# Altium PCB Whisper_pcb.PcbDoc (part 1 of 2)
Units mil, origin at the board's own origin, x right, y up, seen from the top; angles counter-clockwise.
Board outline 2755.91 x 3228.35 mil, 4 copper layers (Top Layer, GND, PWR, Bottom Layer), stack 23.756 mil thick; 209 components, 169 nets, 843 pads, 233 vias.
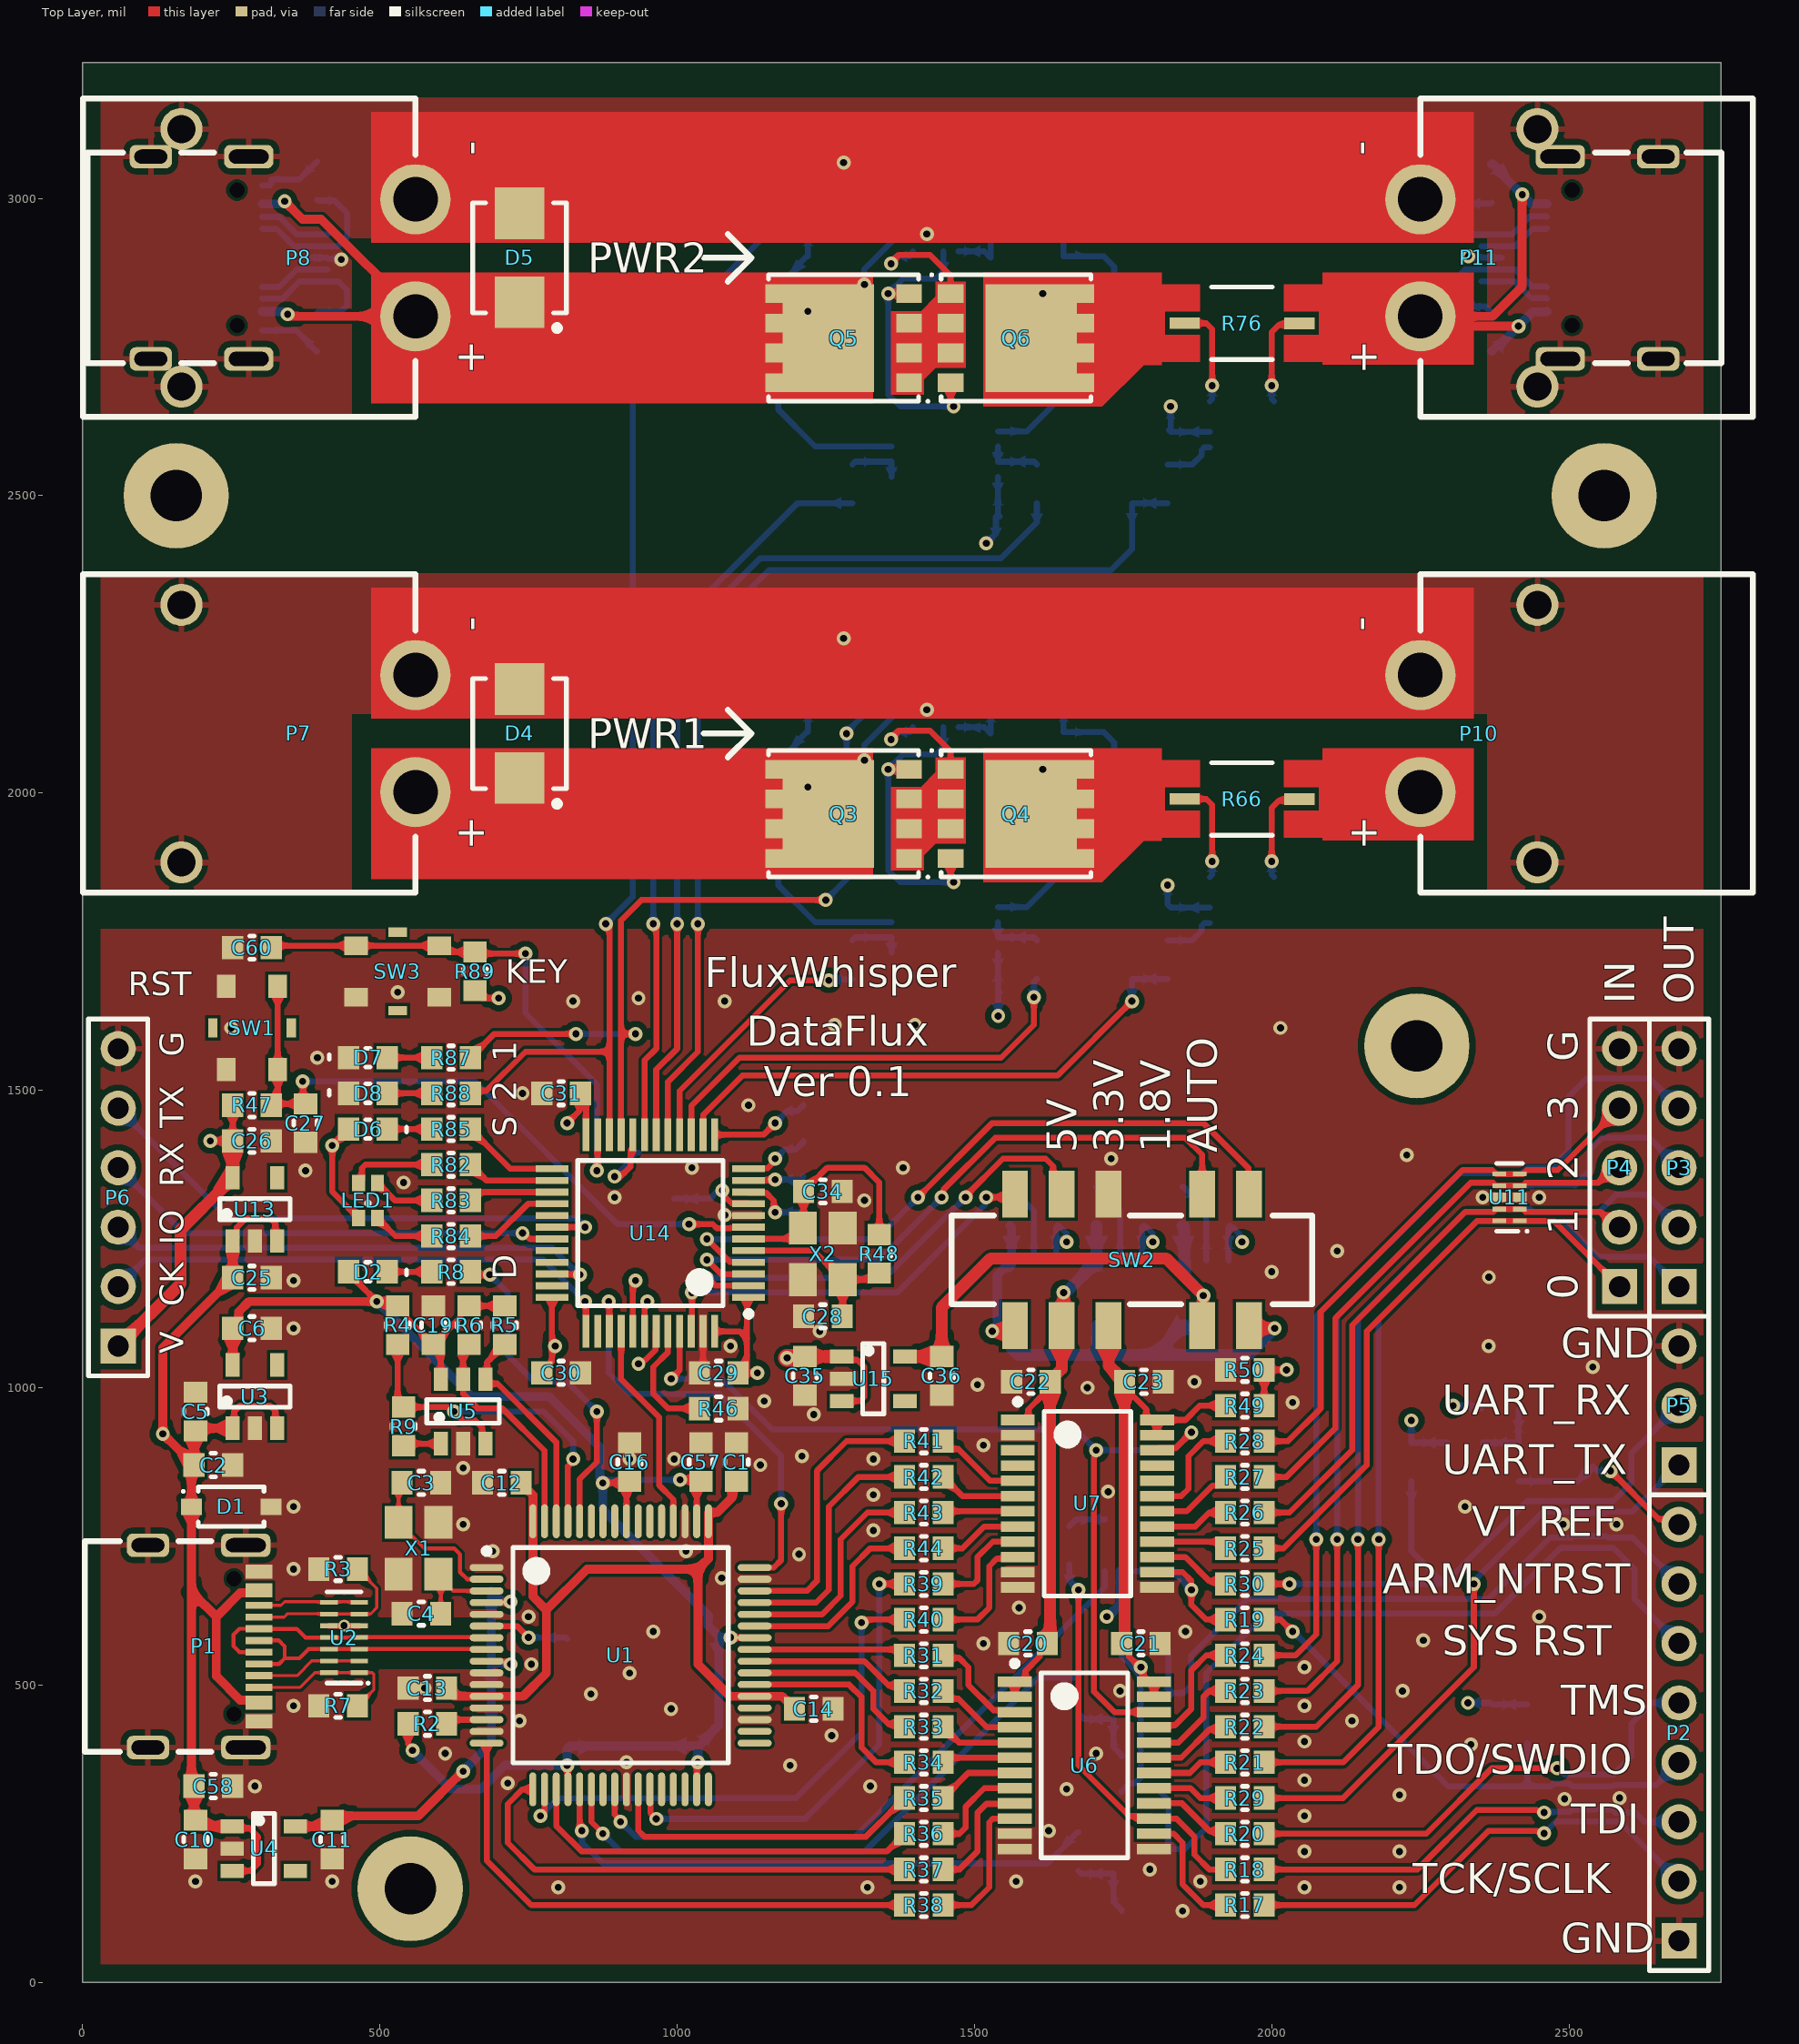
[diagram p0: Top Layer view]
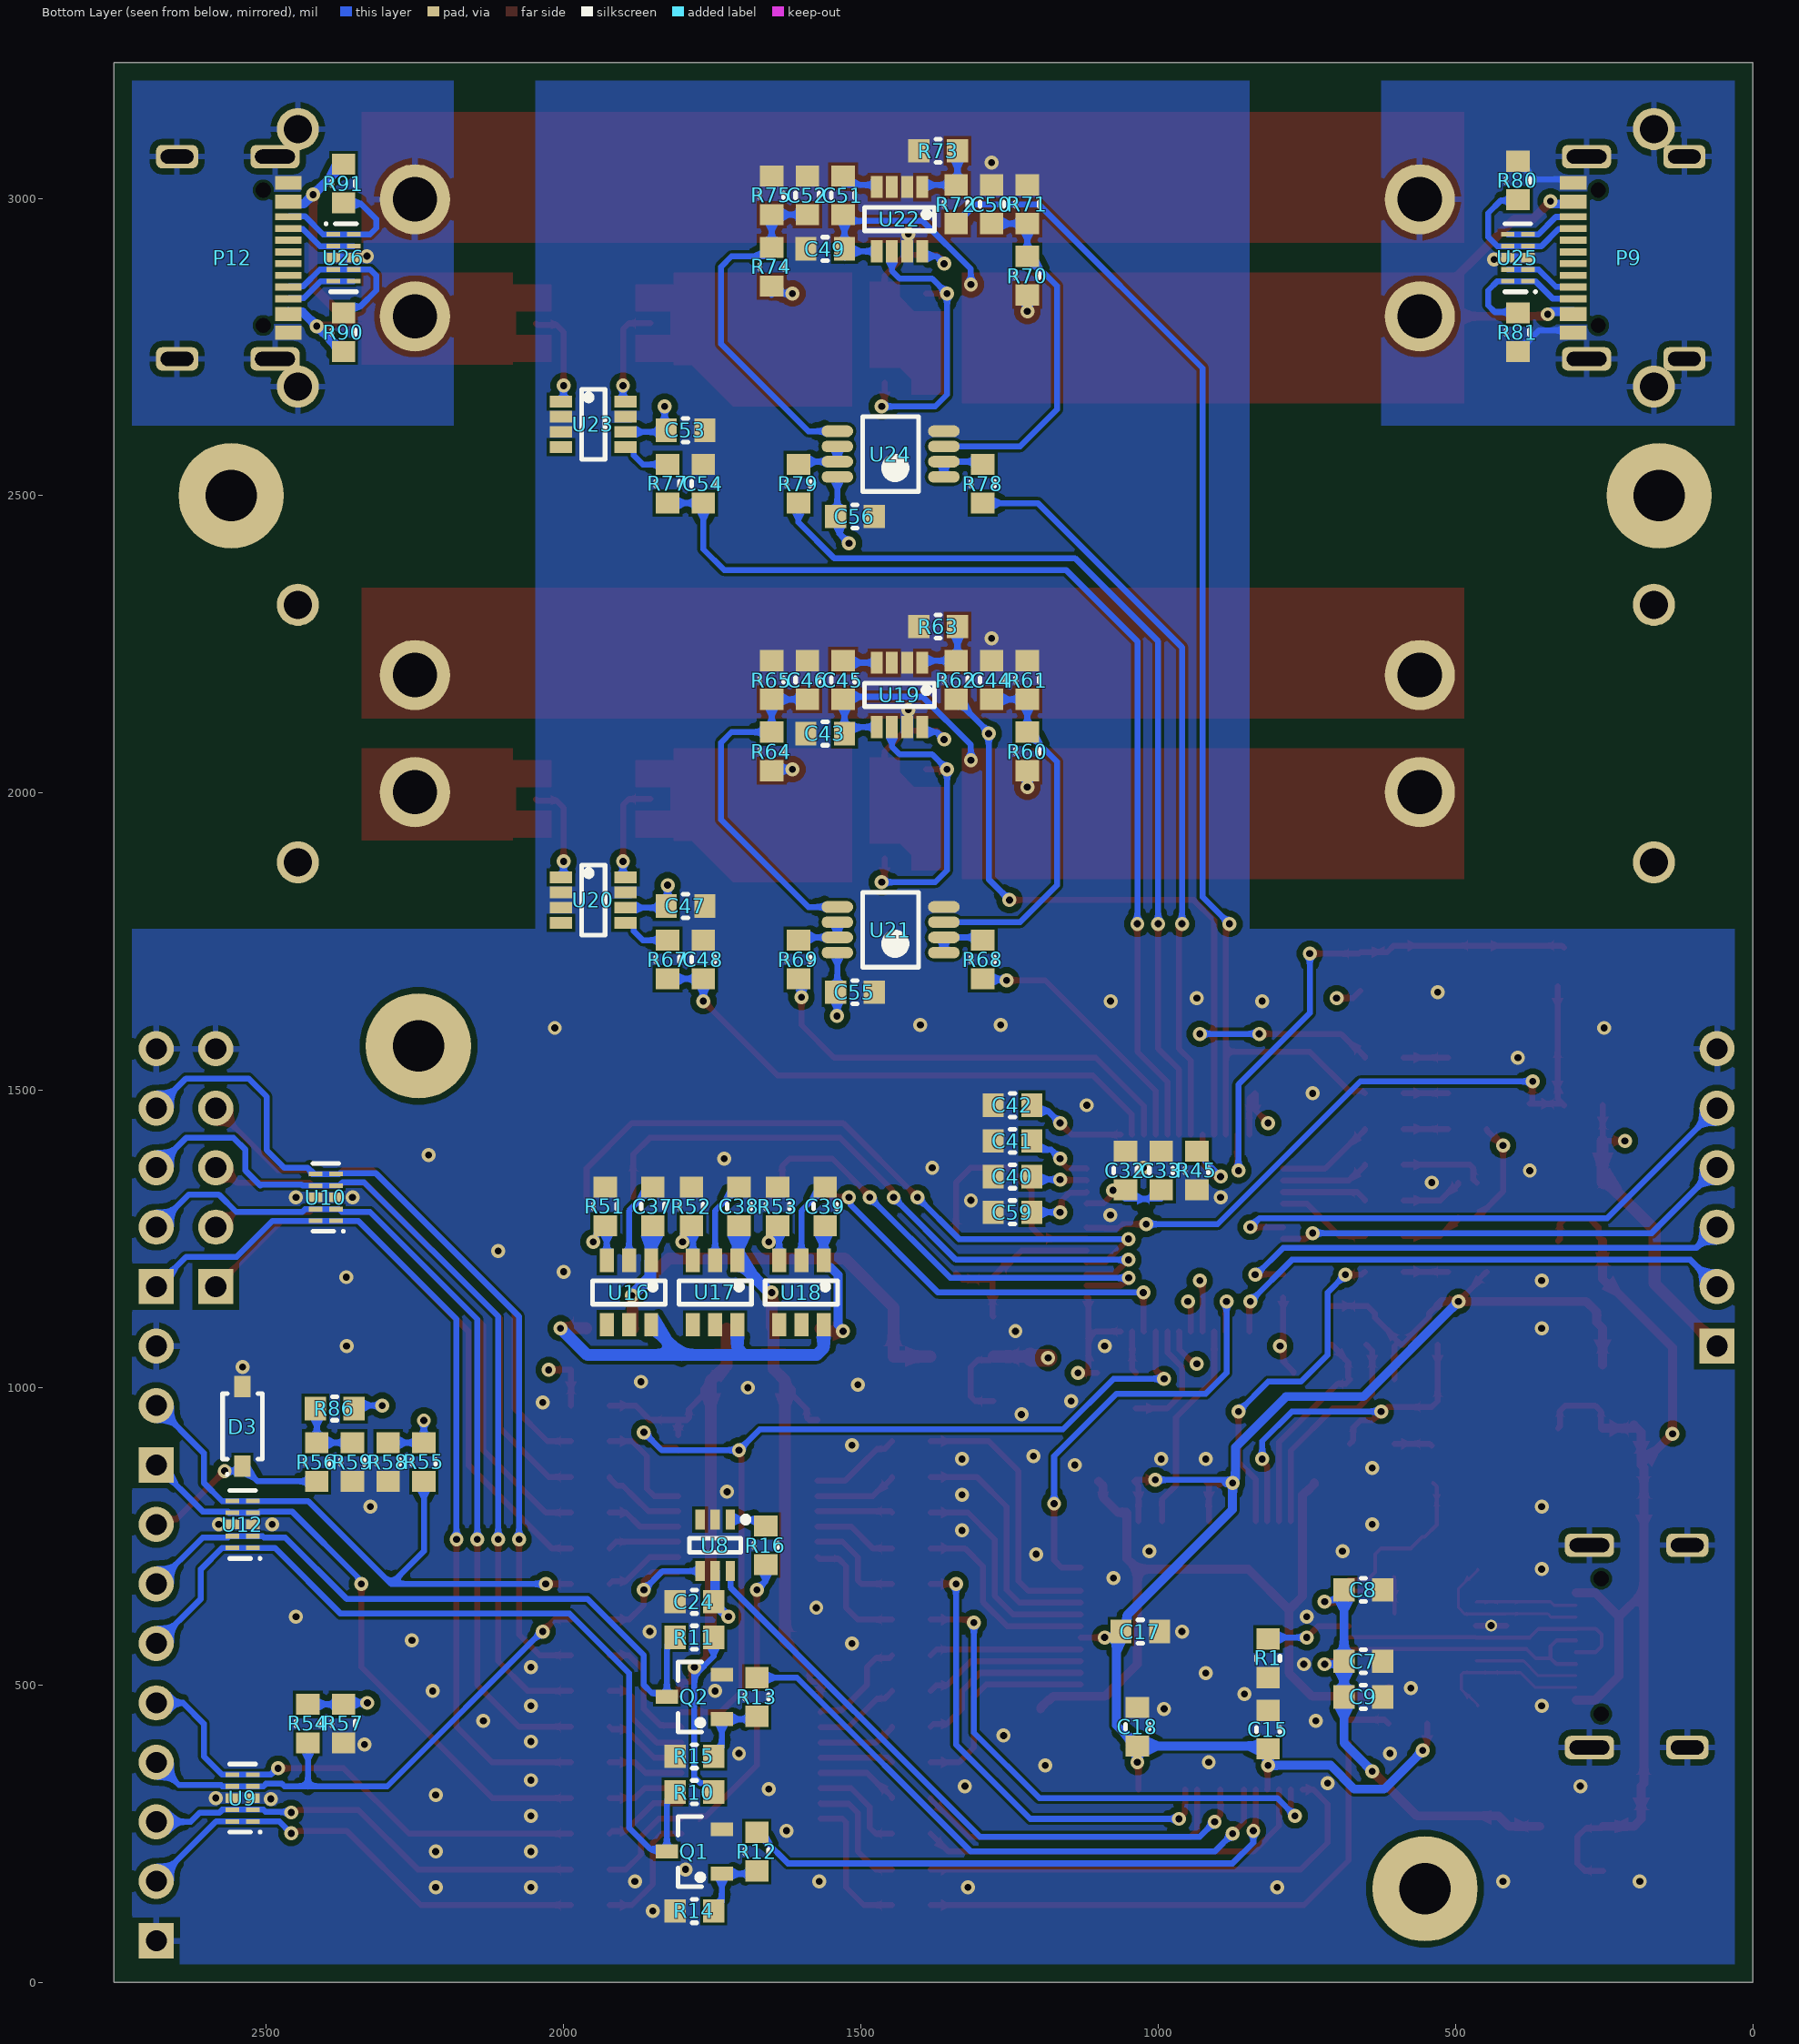
[diagram p1: Bottom Layer view, seen from below]
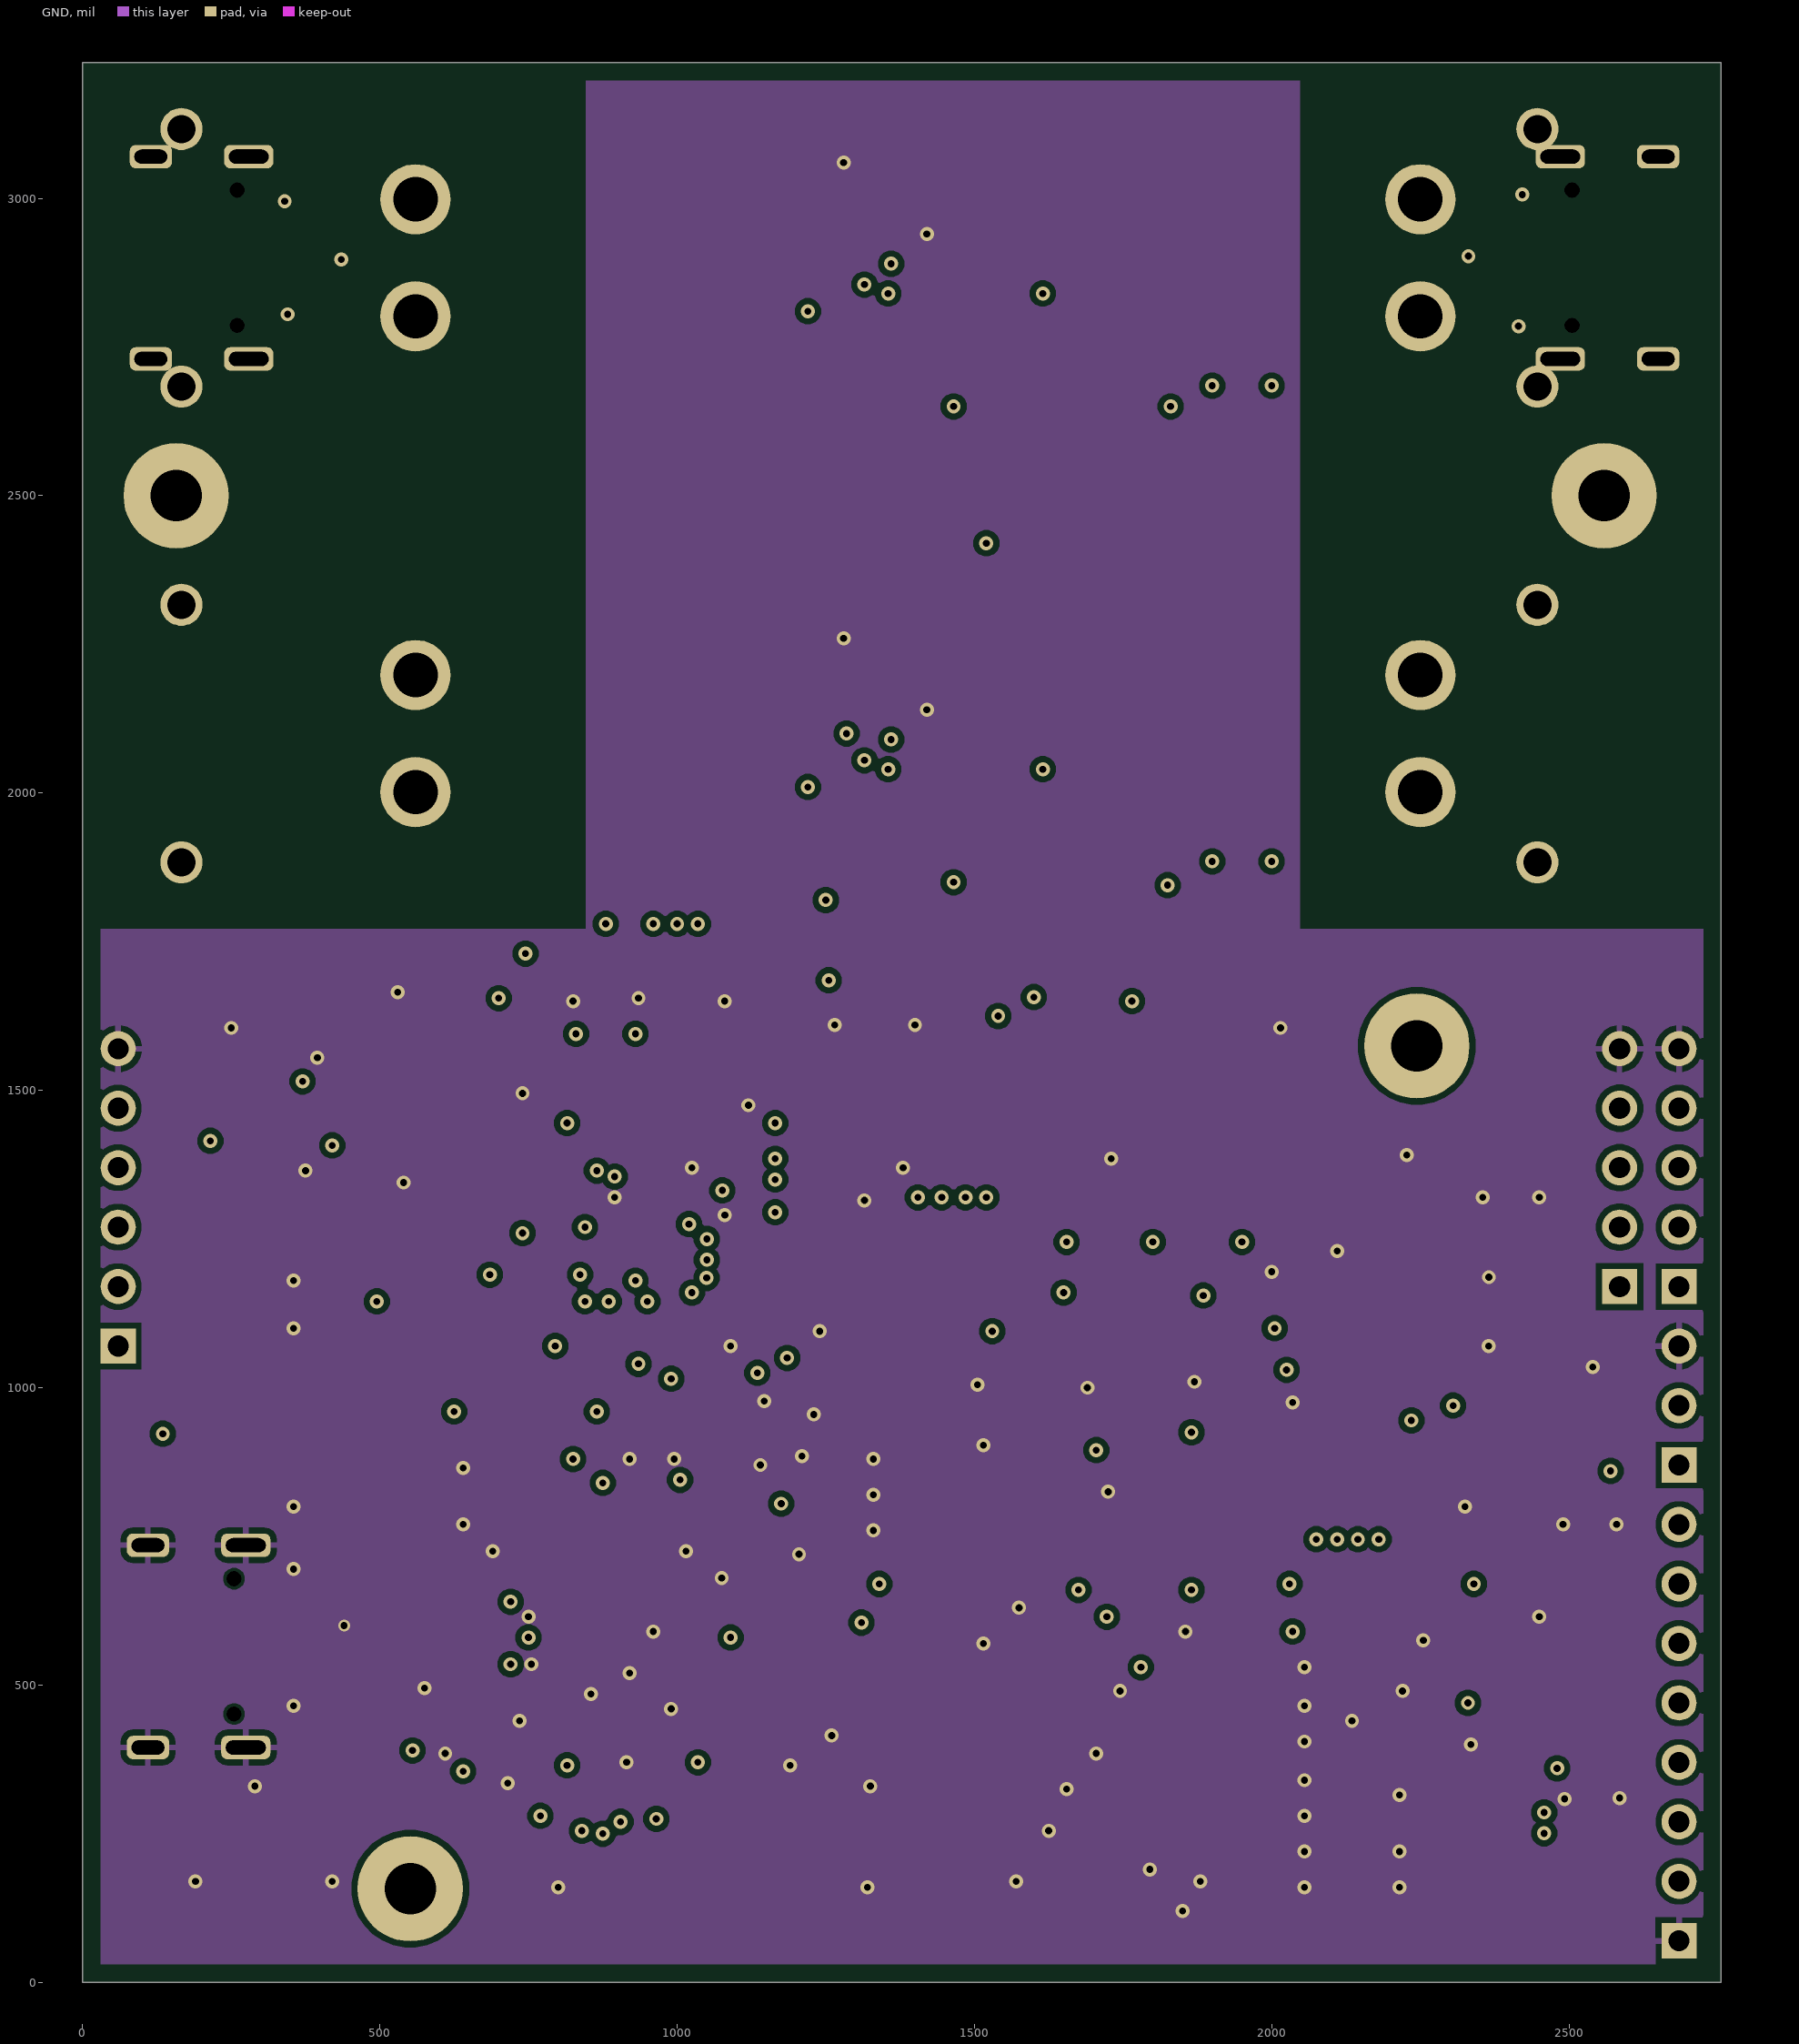
[diagram p2: GND]
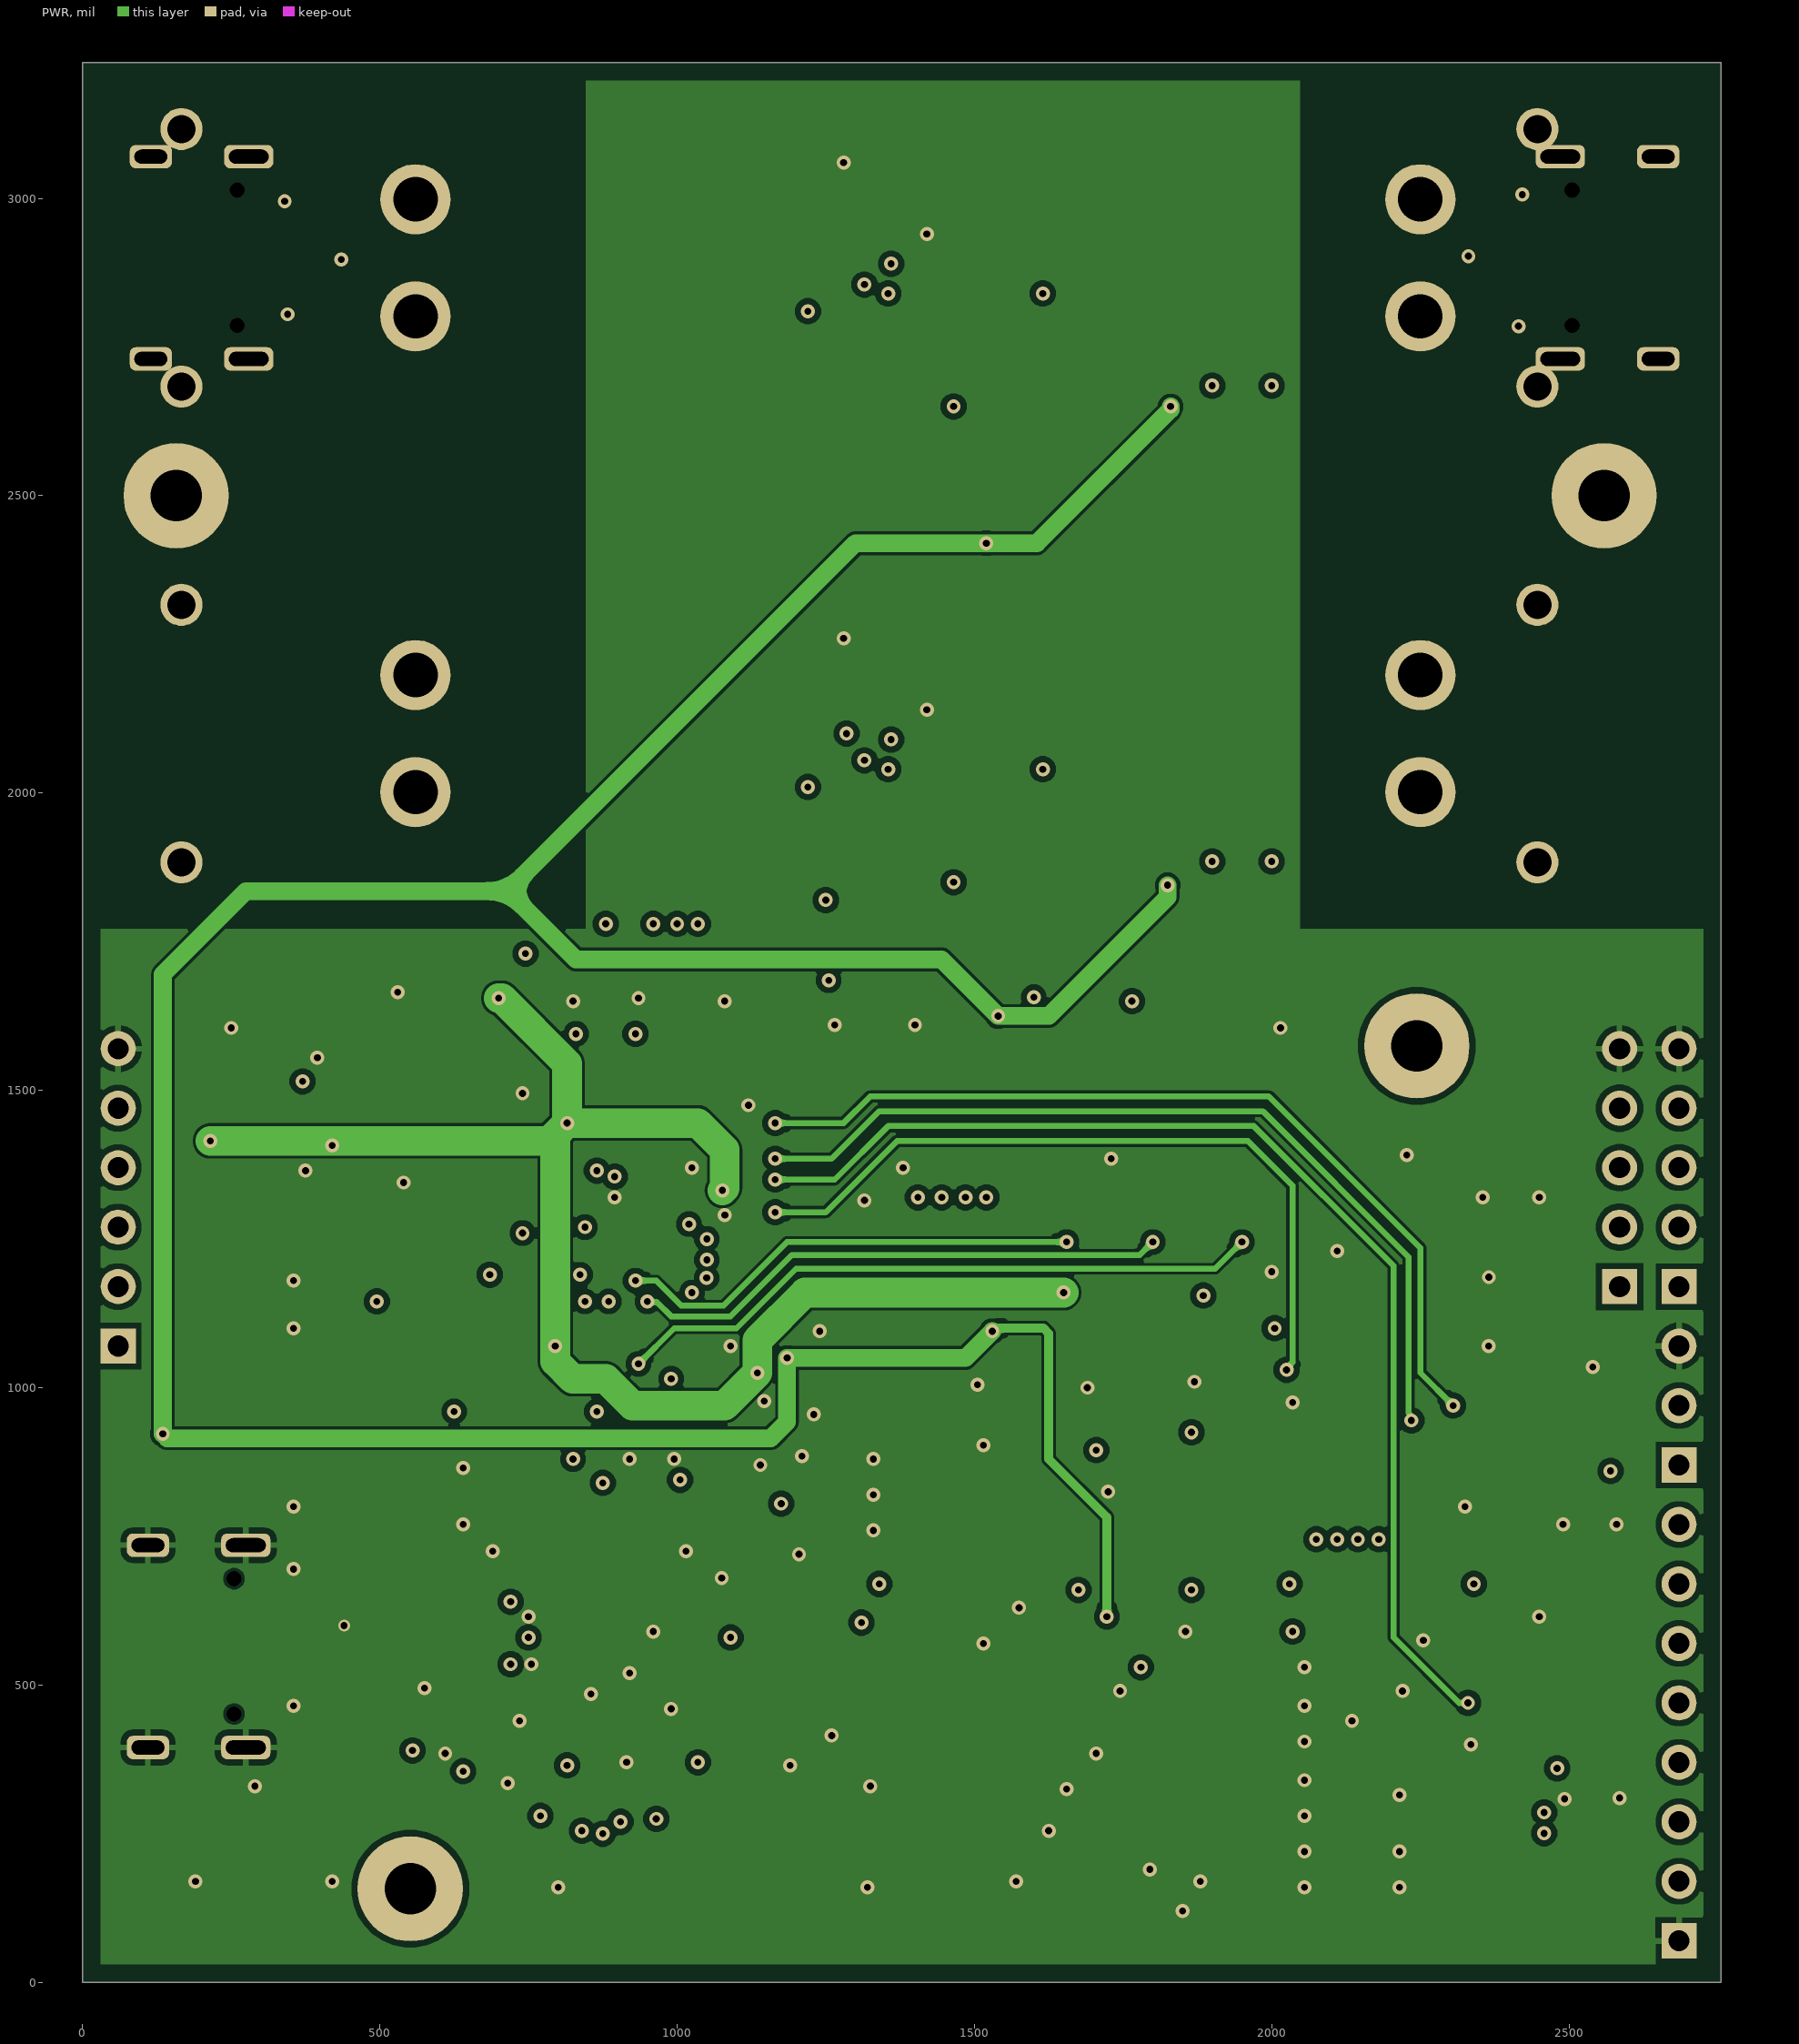
[diagram p3: PWR]
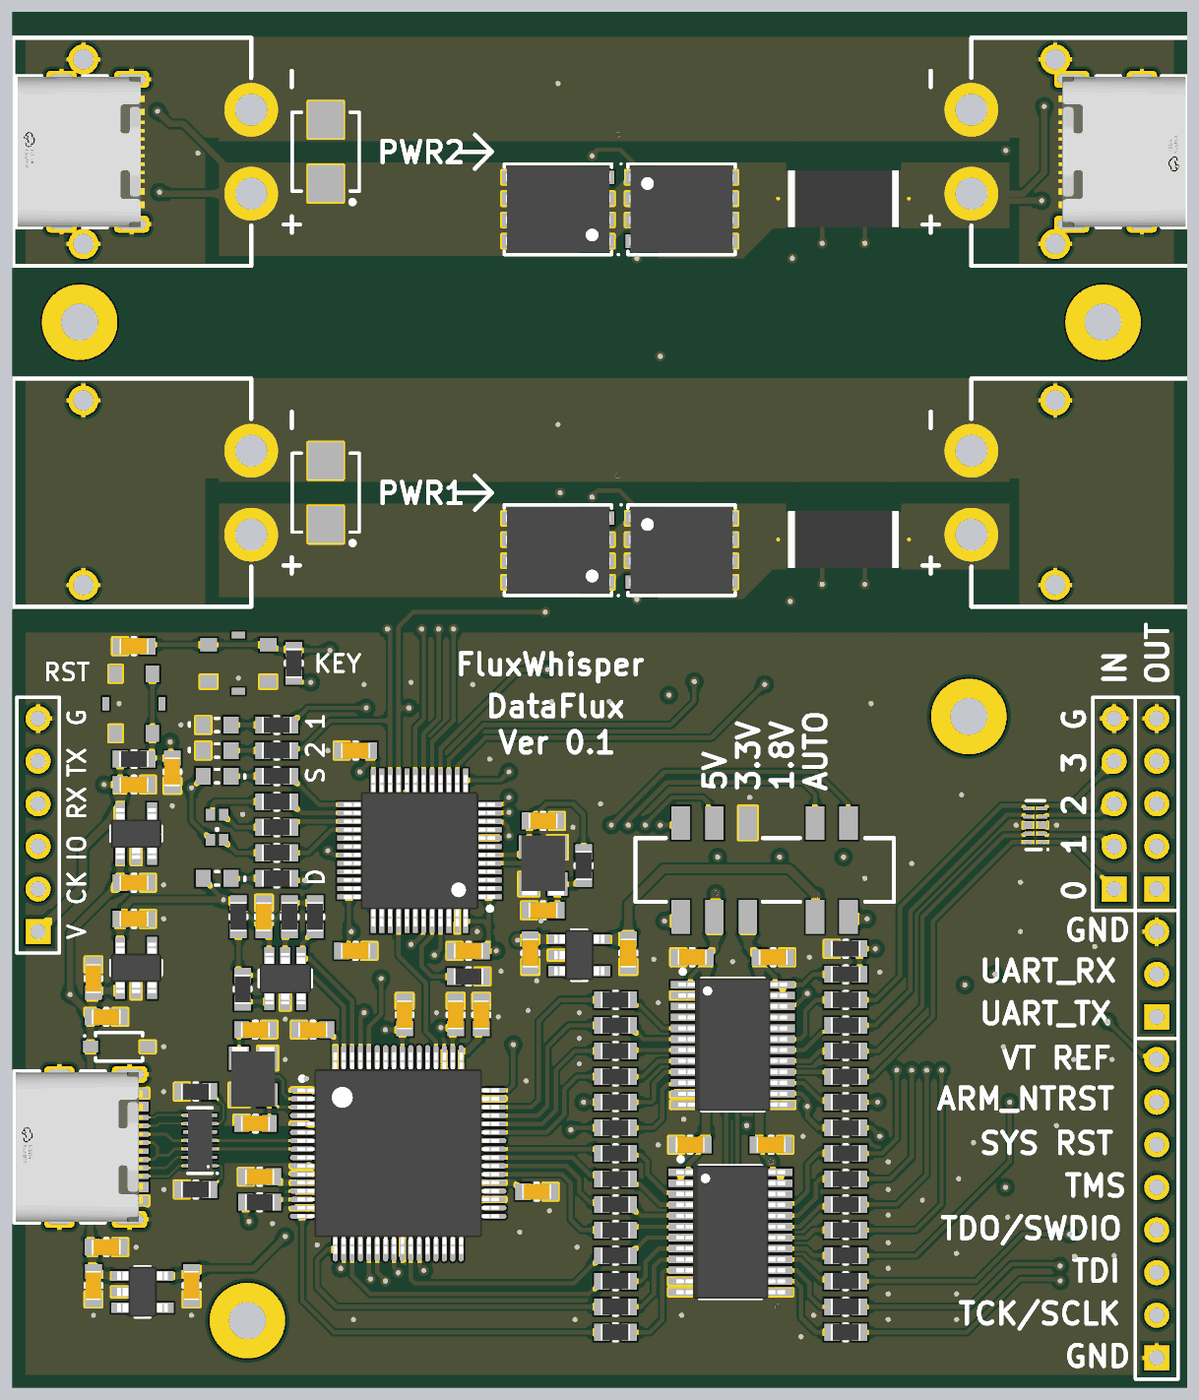
[diagram p5: 3D render of the assembled board from above, using the file's embedded part models]
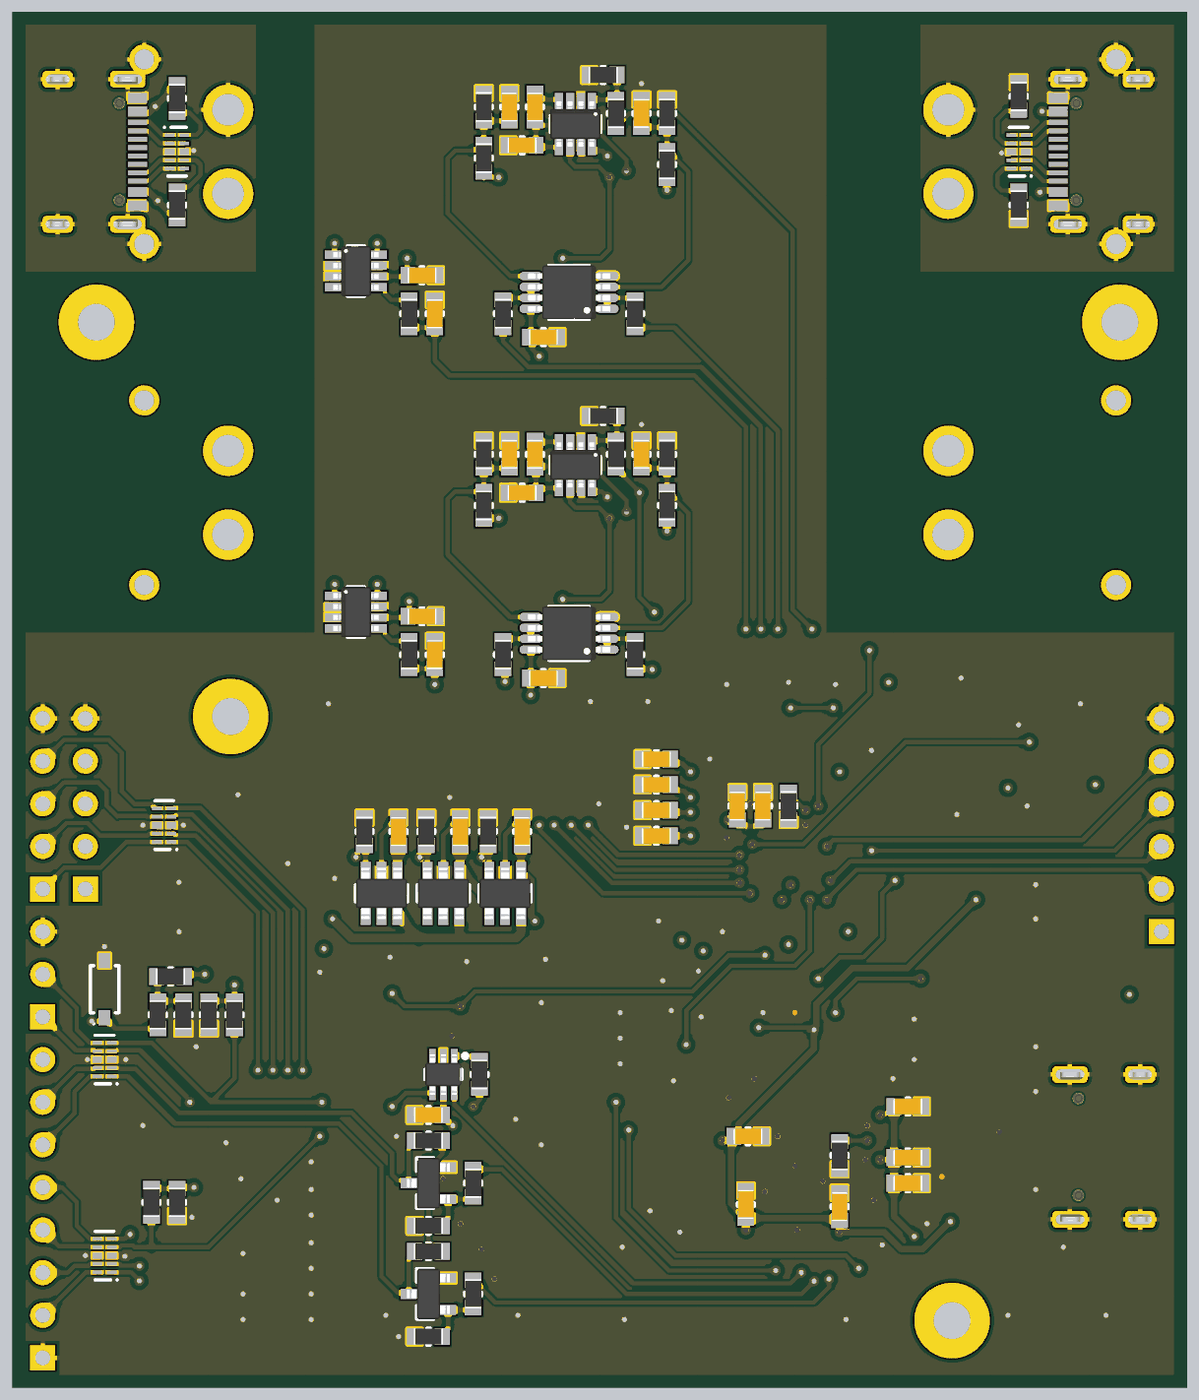
[diagram p6: 3D render of the assembled board from below, using the file's embedded part models]

## Layer stack, top to bottom
Top Solder: solder mask 0.4, Solder Resist, Dk 3.5
Top Layer: signal copper 1.4
Dielectric 2: prepreg 2.8, PP-006, Dk 4.1
GND: signal copper 1.378
Dielectric 1: dielectric 12.6, FR-4, Dk 4.8
PWR: signal copper 1.378
Dielectric 3: prepreg 2.8, PP-006, Dk 4.1
Bottom Layer: signal copper 1.4
Bottom Solder: solder mask 0.4, Solder Resist, Dk 3.5

## Board outline
0,0 2755.91,0 2755.91,3228.35 0,3228.35

## Design rules (kind name [scope] priority, off if disabled: settings)
BoardOutlineClearance [All] p1: gap=15.75 ignorepadtopadclearanceinfootprint=FALSE except(30: Poly-OutlineEdge Poly-CavityEdge Poly-CutoutEdge Poly-SplitBarrior Poly-SplitContinuation)
Clearance Clearance_USB [InNetClass('USB')] p1: gap=5 ignorepadtopadclearanceinfootprint=TRUE except(10: THPad-Fill THPad-Poly THPad-Region Via-Fill Via-Poly Via-Region Fill-Fill Fill-Poly Fill-Region Poly-Poly Poly-Region Region-Region; 30: Arc-Fill Arc-Poly Arc-Region Track-Fill Track-Poly Track-Region)
Clearance [All] p2: gap=5 ignorepadtopadclearanceinfootprint=TRUE except(10: THPad-Fill THPad-Poly THPad-Region Via-Fill Via-Poly Via-Region Fill-Fill Fill-Poly Fill-Region Poly-Poly Poly-Region Region-Region)
ComponentClearance [All] p1: gap=5 collisioncheckmode=3 verticalgap=10 showdistances=FALSE
DiffPairsRouting [InDifferentialPair('USB_D')] p1: maxlimit=14 minlimit=10 mostfreqgap=10 toplayer_prefgap=14 toplayer_minwidth=6.8 toplayer_maxwidth=6.8 toplayer_prefwidth=6.8 midlayer1_maxgap=10 midlayer1_minwidth=15 midlayer1_maxwidth=15 midlayer1_prefwidth=15 midlayer2_maxgap=10 midlayer2_minwidth=15 midlayer2_maxwidth=15 midlayer2_prefwidth=15 bottomlayer_maxgap=10 bottomlayer_minwidth=15 bottomlayer_maxwidth=15 bottomlayer_prefwidth=15 maxuncoupledlength=500
MinimumSolderMaskSliver [All] p1: minsoldermaskwidth=3.94
PolygonConnect [All] p1: thpad.connectstyle=Relief thpad.reliefconductorwidth=10 thpad.reliefentries=4 thpad.polygonreliefangle="90 Angle" thpad.airgapwidth=10 smdpad.connectstyle=Direct smdpad.reliefconductorwidth=10 smdpad.reliefentries=4 smdpad.polygonreliefangle="90 Angle" smdpad.airgapwidth=10 via.connectstyle=Direct via.reliefconductorwidth=10 via.reliefentries=4 via.polygonreliefangle="90 Angle" via.airgapwidth=10
RoutingVias [All] p1: holewidth=11.81 width=23.62 viastyle="Through Hole" minholewidth=11.81 minwidth=19.68 maxholewidth=157.48 maxwidth=196.85
SolderMaskExpansion [All] p1: expansion=4 istentingtop=FALSE
SupplyNets "Schematic Supply Nets_22" [InNet('VTref')] p1: voltage=0.000
SupplyNets "Schematic Supply Nets_21" [InNet('VCORE')] p2: voltage=0.000
SupplyNets "Schematic Supply Nets_20" [InNet('VCC_PORT')] p3: voltage=0.000
SupplyNets "Schematic Supply Nets_19" [InNet('AVCC_FT')] p4: voltage=0.000
SupplyNets "Schematic Supply Nets_18" [InNet('VBUS')] p5: voltage=0.000
SupplyNets "Schematic Supply Nets_17" [InNet('+1.8V')] p6: voltage=0.000
SupplyNets "Schematic Supply Nets_7" [InNet('VCCIO')] p7: voltage=0.000
SupplyNets "Schematic Supply Nets_5" [InNet('VCC_AUTO')] p8: voltage=0.000
SupplyNets "Schematic Supply Nets_3" [InNet('VCC')] p9: voltage=0.000
SupplyNets "Schematic Supply Nets" [InNet('GND')] p10: voltage=0.000
Width [All] p1: maxlimit=100 minlimit=5 preferedwidth=10 minimp=50.000000 maximp=50.000000 favimp=50.000000
27 further rules are at their usual default settings.

## Classes and differential pairs
net class USB: USB_D_N USB_D_P
component class Whisper_Power: C43 C44 C45 C46 C47 C48 C49 C50 C51 C52 C53 C54 C55 C56 D4 D5 P7 P8 P9 P10 P11 P12 Q3 Q4 Q5 Q6 R60 R61 R62 R63 R64 R65 R66 R67 R68 R69 R70 R71 R72 R73 R74 R75 R76 R77 R78 R79 R80 R81 R90 R91 U19 U20 U21 U22 U23 U24 U25 U26
component class Whisper_Ports: C20 C21 C22 C23 C24 P2 P3 P4 P5 Q1 Q2 R10 R11 R12 R13 R14 R15 R16 R17 R18 R19 R20 R21 R22 R23 R24 R25 R26 R27 R28 R29 R30 R31 R32 R33 R34 R35 R36 R37 R38 R39 R40 R41 R42 R43 R44 U6 U7 U8 U9 U10 U11 U12
component class Whisper_MCU: C25 C26 C27 C28 C29 C30 C31 C32 C33 C34 C35 C36 C37 C38 C39 C40 C41 C42 C59 C60 D3 D6 D7 D8 LED1 P6 R45 R46 R47 R48 R49 R50 R51 R52 R53 R54 R55 R56 R57 R58 R59 R82 R83 R84 R85 R86 R87 R88 R89 SW1 SW2 SW3 U13 U14 U15 U16 U17 U18 X2
component class Whisper_Debugger: C1 C2 C3 C4 C5 C6 C7 C8 C9 C10 C11 C12 C13 C14 C15 C16 C17 C18 C19 C57 C58 D1 D2 P1 R1 R2 R3 R4 R5 R6 R7 R8 R9 U1 U2 U3 U4 U5 X1
differential pair USB_D: +USB_D_P -USB_D_N

## Components (designator, comment, footprint, x,y, rotation, side; value= is the part's Value field where it differs from the comment)
C1 "100nF" 0603-Cap 1100,875 r270 top
C2 "10uF" 0603-Cap 220,870 r180 top
C3 "12pF" 0603-Cap 570,840 r0 top
C4 "12pF" 0603-Cap 570,620 r180 top
C5 "10uF" 0603-Cap 190,960 r270 top
C6 "10uF" 0603-Cap 285,1100 r180 top
C7 "100nF" 0603-Cap 655,540 r0 bottom
C8 "100nF" 0603-Cap 655,660 r0 bottom
C9 "10uF" 0603-Cap 655,480 r0 bottom
C10 "10uF" 0603-Cap 190,240 r90 top
C11 "10uF" 0603-Cap 420,240 r90 top
C12 "100nF" 0603-Cap 705,840 r0 top
C13 "100nF" 0603-Cap 580,495 r0 top
C14 "100nF" 0603-Cap 1230,460 r180 top
C15 "100nF" 0603-Cap 815,425 r270 bottom
C16 "100nF" 0603-Cap 920,875 r270 top
C17 "100nF" 0603-Cap 1030,590 r0 bottom
C18 "100nF" 0603-Cap 1035,430 r270 bottom
C19 "100nF" 0603-Cap 590,1105 r270 top
C20 "100nF" 0603-Cap 1590,570 r0 top
C21 "100nF" 0603-Cap 1780,570 r0 top
C22 "100nF" 0603-Cap 1595,1010 r0 top
C23 "100nF" 0603-Cap 1785,1010 r0 top
C24 "100nF" 0603-Cap 1780,640 r0 bottom
C25 "10uF" 0603-Cap 285,1185 r180 top
C26 "10uF" 0603-Cap 285,1415 r180 top
C27 "1uF" 0603-Cap 375,1445 r90 top
C28 "12pF" 0603-Cap 1245,1120 r0 top
C29 "100nF" 0603-Cap 1070,1025 r0 top
C30 "100nF" 0603-Cap 805,1025 r180 top
C31 "100nF" 0603-Cap 805,1495 r0 top
C32 "1uF" 0603-Cap 1055,1365 r270 bottom
C33 "10uF" 0603-Cap 995,1365 r270 bottom
C34 "12pF" 0603-Cap 1245,1330 r180 top
C35 "10uF" 0603-Cap 1215,1020 r90 top
C36 "10uF" 0603-Cap 1445,1020 r90 top
C37 "100nF" 0603-Cap 1850,1305 r90 bottom
C38 "100nF" 0603-Cap 1705,1305 r90 bottom
C39 "100nF" 0603-Cap 1560,1305 r90 bottom
C40 "10nF" 0603-Cap 1245,1355 r0 bottom
C41 "10nF" 0603-Cap 1245,1415 r0 bottom
C42 "10nF" 0603-Cap 1245,1475 r0 bottom
C43 "100nF" 0603-Cap 1560,2100 r180 bottom
C44 "100nF" 0603-Cap 1280,2190 r270 bottom
C45 "1uF" 0603-Cap 1530,2190 r270 bottom
C46 "100nF" 0603-Cap 1590,2190 r270 bottom
C47 "100nF" 0603-Cap 1795,1810 r0 bottom
C48 "10nF" 0603-Cap 1765,1720 r270 bottom
C49 "100nF" 0603-Cap 1560,2915 r180 bottom
C50 "100nF" 0603-Cap 1280,2990 r270 bottom
C51 "1uF" 0603-Cap 1530,3005 r270 bottom
C52 "100nF" 0603-Cap 1590,3005 r270 bottom
C53 "100nF" 0603-Cap 1795,2610 r0 bottom
C54 "10nF" 0603-Cap 1765,2520 r270 bottom
C55 "100nF" 0603-Cap 1510,1665 r0 bottom
C56 "100nF" 0603-Cap 1510,2465 r0 bottom
C57 "100nF" 0603-Cap 1040,875 r90 top
C58 "10uF" 0603-Cap 220,330 r180 top
C59 "10nF" 0603-Cap 1245,1295 r0 bottom
C60 "1uF" 0603-Cap 285,1740 r0 top
D1 "SMF5.0" SOD-123 250,800 r0 top
D2 "LED" 0603-1 480,1195 r0 top
D3 "SMF5.0" SOD-123 2540,935 r90 bottom
D4 "SMBJ60A" "SMB (DO-214AA)" 735,2100 r270 top
D5 "SMBJ60A" "SMB (DO-214AA)" 735,2900 r270 top
D6 "LED" 0603-1 480,1435 r0 top
D7 "LED" 0603-1 480,1555 r180 top
D8 "LED" 0603-1 480,1495 r180 top
LED1 "LTST-C19HE1WT-H" RGB1.6*1.6 480,1315 r0 top
P1 "USB-C-16P" USB-C-16P#1 110,565 r270 top
P2 "Header 8" HDR1X8 2685,70 r90 top
P3 "Header 5" HDR1X5 2685,1170 r90 top
P4 "Header 5" HDR1X5 2585,1170 r90 top
P5 "Header 3" HDR1X3 2685,870 r90 top
P6 "Header 6" HDR1X6 60,1070 r90 top
P7 "XT30" XT30PW-M30 560,2100 r90 top
P8 "XT30" XT30PW-M30 560,2900 r90 top
P9 "USB-C-16P" USB-C-16P#2 115,2900 r270 bottom
P10 "XT30" XT30PW-F30 2250,2100 r270 top
P11 "XT30" XT30PW-F30 2250,2900 r270 top
P12 "USB-C-16P" USB-C-16P#2 2650,2900 r90 bottom
Q1 "BSS138LT1G" SOT23 1780,220 r0 bottom
Q2 "BSS138LT1G" SOT23 1780,480 r0 bottom
Q3 "CRSM034N06L2" DFN5x6-MOS 1280,1965 r180 top
Q4 "CRSM034N06L2" DFN5x6-MOS 1570,1965 r0 top
Q5 "CRSM034N06L2" DFN5x6-MOS 1280,2765 r180 top
Q6 "CRSM034N06L2" DFN5x6-MOS 1570,2765 r0 top
R1 "12k" 0603 815,545 r270 bottom
R2 "10k" 0603 580,435 r180 top
R3 "5.1k" 0603 430,695 r0 top
R4 "10k" 0603 530,1105 r270 top
R5 "10k" 0603 710,1105 r270 top
R6 "10k" 0603 650,1105 r270 top
R7 "5.1k" 0603 430,465 r0 top
R8 "1k" 0603 620,1195 r0 top
R9 "2.2k" 0603 540,935 r90 top
R10 "10k" 0603 1780,320 r180 bottom
R11 "10k" 0603 1780,580 r180 bottom
R12 "100" 0603 1675,220 r270 bottom
R13 "100" 0603 1675,480 r270 bottom
R14 "100k" 0603 1780,120 r180 bottom
R15 "100k" 0603 1780,380 r180 bottom
R16 "330" 0603 1660,735 r90 bottom
R17 "33" 0603 1955,130 r0 top
R18 "33" 0603 1955,190 r0 top
R19 "33" 0603 1955,610 r0 top
R20 "33" 0603 1955,250 r0 top
R21 "33" 0603 1955,370 r0 top
R22 "33" 0603 1955,430 r0 top
R23 "33" 0603 1955,490 r0 top
R24 "33" 0603 1955,550 r0 top
R25 "33" 0603 1955,730 r0 top
R26 "33" 0603 1955,790 r0 top
R27 "33" 0603 1955,850 r0 top
R28 "33" 0603 1955,910 r0 top
R29 "33" 0603 1955,310 r0 top
R30 "33" 0603 1955,670 r0 top
R31 "33" 0603 1415,550 r0 top
R32 "33" 0603 1415,490 r0 top
R33 "33" 0603 1415,430 r0 top
R34 "33" 0603 1415,370 r0 top
R35 "33" 0603 1415,310 r0 top
R36 "33" 0603 1415,250 r0 top
R37 "33" 0603 1415,190 r0 top
R38 "33" 0603 1415,130 r0 top
R39 "33" 0603 1415,670 r0 top
R40 "33" 0603 1415,610 r0 top
R41 "33" 0603 1415,910 r0 top
R42 "33" 0603 1415,850 r0 top
R43 "33" 0603 1415,790 r0 top
R44 "33" 0603 1415,730 r0 top
R45 "10k" 0603 935,1365 r270 bottom
R46 "10k" 0603 1070,965 r0 top
R47 "10k" 0603 285,1475 r0 top
R48 "1M" 0603 1340,1225 r270 top
R49 "10k" 0603 1955,970 r180 top
R50 "10k" 0603 1955,1030 r0 top
R51 "10k" 0603 1930,1305 r90 bottom
R52 "10k" 0603 1785,1305 r90 bottom
R53 "10k" 0603 1640,1305 r90 bottom
R54 "1M" 0603 2430,435 r270 bottom
R55 "1M" 0603 2235,875 r270 bottom
R56 "10k" 0603 2415,875 r270 bottom
R57 "1M" 0603 2370,435 r90 bottom
R58 "1M" 0603 2295,875 r90 bottom
R59 "5.1k" 0603 2355,875 r90 bottom
R60 "100k" 0603 1220,2070 r90 bottom
R61 "5.1k" 0603 1220,2190 r90 bottom
R62 "100" 0603 1340,2190 r90 bottom
R63 "100k" 0603 1370,2280 r0 bottom
R64 "100k" 0603 1650,2070 r90 bottom
R65 "5.1k" 0603 1650,2190 r90 bottom
R66 "5mR" "2512 - 4W" 1950,1990 r0 top
R67 "100" 0603 1825,1720 r90 bottom
R68 "100" 0603 1295,1720 r90 bottom
R69 "100" 0603 1605,1720 r90 bottom
R70 "100k" 0603 1220,2870 r90 bottom
R71 "5.1k" 0603 1220,2990 r90 bottom
R72 "100" 0603 1340,2990 r90 bottom
R73 "100k" 0603 1370,3080 r0 bottom
R74 "100k" 0603 1650,2885 r90 bottom
R75 "5.1k" 0603 1650,3005 r90 bottom
R76 "5mR" "2512 - 4W" 1950,2790 r0 top
R77 "100" 0603 1825,2520 r90 bottom
R78 "100" 0603 1295,2520 r90 bottom
R79 "100" 0603 1605,2520 r90 bottom
R80 "5.1k" 0603 395,3030 r270 bottom
R81 "5.1k" 0603 395,2775 r90 bottom
R82 "1k" 0603 620,1375 r0 top
R83 "1k" 0603 620,1315 r0 top
R84 "1k" 0603 620,1255 r0 top
R85 "1k" 0603 620,1435 r0 top
R86 "10k" 0603 2385,965 r0 bottom
R87 "1k" 0603 620,1555 r0 top
R88 "1k" 0603 620,1495 r0 top
R89 "10k" 0603 660,1700 r90 top
R90 "10k" 0603 2370,2775 r270 bottom
R91 "10k" 0603 2370,3025 r270 bottom
SW1 "TS-1177" BTN3*3 285,1605 r270 top
SW2 "SW_2P4T" SW-SS-3456S-02-L1 1765,1215 r180 top
SW3 "TS-1177" BTN3*3 530,1700 r0 top
U1 "FT4232H-64" LQFP-64 905,550 r0 top
U2 "TPD6E05U06" SON-14-RVZ 440,580 r180 top
U3 "TPS7A2033PDBV" SOT23-5 290,985 r90 top
U4 "TPS7A2033PDBV" SOT23-5 305,225 r0 top
U5 "93LC46-SOT236" SOT236 640,960 r90 top
U6 "74LXC8T245" TSSOP-24 1685,365 r0 top
U7 "74LXC8T245" TSSOP-24 1690,805 r0 top
U8 "BL1551B" SC70 1745,735 r270 bottom
U9 "TPD4E05U06DQAR" SON-10-DQA 2540,310 r0 bottom
U10 "TPD4E05U06DQAR" SON-10-DQA 2400,1320 r0 bottom
U11 "TPD4E05U06DQAR" SON-10-DQA 2400,1320 r180 top
U12 "TPD4E05U06DQAR" SON-10-DQA 2540,770 r0 bottom
U13 "TPS7A2033PDBV" SOT23-5 290,1300 r90 top
U14 "AT32F435CCT" LQFP-48 955,1260 r180 top
U15 "TPS7A2018PDBV" SOT23-5 1330,1015 r0 top
U16 "TPS22917" SOT236 1890,1160 r270 bottom
U17 "TPS22917" SOT236 1745,1160 r270 bottom
U18 "TPS22917" SOT236 1600,1160 r270 bottom
U19 "LM74502" SOT23-8 1435,2165 r270 bottom
U20 "INA241A3" SOT23-8 1950,1820 r180 bottom
U21 "TLV9002" MSOP8 1450,1770 r0 bottom
U22 "LM74502" SOT23-8 1435,2965 r270 bottom
U23 "INA241A3" SOT23-8 1950,2620 r180 bottom
U24 "TLV9002" MSOP8 1450,2570 r0 bottom
U25 "TPD4E05U06DQAR" SON-10-DQA 395,2900 r0 bottom
U26 "TPD4E05U06DQAR" SON-10-DQA 2370,2900 r180 bottom
X1 "12M" XTAL-3225-4P 565,730 r90 top
X2 "12M" XTAL-3225-4P 1245,1225 r270 top

## Footprints (in the part's own frame and the unit in brackets; to place one, negate y for a bottom-side part, rotate by r counter-clockwise, add the part's x,y. Pads: shape width x height; smd on the part's side, far side on the other; paste and mask are expansions set on the pad)
0603 [mm]
  rect 0.9x1 smd: 1(-0.825,0) 2(0.825,0)
  silkscreen extent -0.1,-0.5 0.1,0.5, body extent -0.87,-0.48 0.87,0.48, height 0.5
0603-1 [mm]
  rect 0.9x1 smd: 1(-0.825,0) 2(0.825,0)
  silkscreen extent -0.1,-0.4 1.65,0.4
0603-Cap [mm]
  rect 0.9x1 smd: 1(-0.825,0) 2(0.825,0)
  silkscreen extent -0.1,-0.5 0.1,0.5, body extent -0.87,-0.48 0.87,0.48, height 0.5
"2512 - 4W" [mm]
  round 0.025 smd: 1(-3.9,0) 2(3.9,0)
  rect 1.3x0.5 smd: 3(-2.45,0) 4(2.456,-0.013)
  Top Layer region: -1.8,0.5 -3.3,0.5 -3.3,-0.5 -1.8,-0.5 -1.8,-1.65 -4.4,-1.65 -4.4,1.65 -1.8,1.65
  Top Layer region: 1.8,-0.5 3.3,-0.5 3.3,0.5 1.8,0.5 1.8,1.65 4.4,1.65 4.4,-1.65 1.8,-1.65
  silkscreen extent -1.3,-1.55 1.3,1.55, body extent -3.3,-1.7 3.3,1.7, height 0.65
BTN3*3 [mm]
  rect 1x0.8 smd: 1(-1.775,1.1) 1(1.775,1.1) 2(-1.775,-1.1) 2(1.775,-1.1)
  rect 0.8x0.4 smd: ""(0,1.675) ""(0,-1.675)
DFN5x6-MOS [mm]
  rect 1.1x0.8 smd: 1(-2.795,-1.905) 2(-2.795,1.905) 2(-2.795,-0.635) 2(-2.795,0.635) 3(2.795,1.905) 3(2.795,-0.635) 3(2.795,0.635) 3(2.795,-1.905)
  rect 3.9x4.6 smd: 3(0.65,0)
  silkscreen extent -3.65,-2.7 3.2,2.75, body extent -3.1,-2.55 3.1,2.55, height 1
HDR1X3 [mm] "Connector; Header; 3 Position"
  rect 1.5x1.5 hole 0.9: 1(0,0)
  round 1.5 hole 0.9: 2(2.54,0) 3(5.08,0)
  silkscreen extent -1.27,-1.27 6.35,1.27
HDR1X5 [mm] "Connector; Header; 5 Position"
  rect 1.5x1.5 hole 0.9: 1(0,0)
  round 1.5 hole 0.9: 2(2.54,0) 3(5.08,0) 4(7.62,0) 5(10.16,0)
  silkscreen extent -1.27,-1.27 11.43,1.27
HDR1X6 [mm] "Connector; Header; 6 Position"
  rect 1.5x1.5 hole 0.9: 1(0,0)
  round 1.5 hole 0.9: 2(2.54,0) 3(5.08,0) 4(7.62,0) 5(10.16,0) 6(12.7,0)
  silkscreen extent -1.27,-1.27 13.97,1.27
HDR1X8 [mm] "Connector; Header; 8 Position"
  rect 1.5x1.5 hole 0.9: 1(0,0)
  round 1.5 hole 0.9: 2(2.54,0) 3(5.08,0) 4(7.62,0) 5(10.16,0) 6(12.7,0) 7(15.24,0) 8(17.78,0)
  silkscreen extent -1.27,-1.27 19.05,1.27
LQFP-48 [mm] "TSQFP, 48-Leads, Body 7.00x7.00mm, Pitch 0.50mm, IPC Medium Density"
  rect 1.4x0.3 smd: 1(-4.2,2.75) 2(-4.2,2.25) 3(-4.2,1.75) 4(-4.2,1.25) 5(-4.2,0.75) 6(-4.2,0.25) 7(-4.2,-0.25) 8(-4.2,-0.75) 9(-4.2,-1.25) 10(-4.2,-1.75) 11(-4.2,-2.25) 12(-4.2,-2.75) 25(4.2,-2.75) 26(4.2,-2.25) 27(4.2,-1.75) 28(4.2,-1.25) 29(4.2,-0.75) 30(4.2,-0.25) 31(4.2,0.25) 32(4.2,0.75) 33(4.2,1.25) 34(4.2,1.75) 35(4.2,2.25) 36(4.2,2.75)
  rect 0.3x1.4 smd: 13(-2.75,-4.2) 14(-2.25,-4.2) 15(-1.75,-4.2) 16(-1.25,-4.2) 17(-0.75,-4.2) 18(-0.25,-4.2) 19(0.25,-4.2) 20(0.75,-4.2) 21(1.25,-4.2) 22(1.75,-4.2) 23(2.25,-4.2) 24(2.75,-4.2) 37(2.75,4.2) 38(2.25,4.2) 39(1.75,4.2) 40(1.25,4.2) 41(0.75,4.2) 42(0.25,4.2) 43(-0.25,4.2) 44(-0.75,4.2) 45(-1.25,4.2) 46(-1.75,4.2) 47(-2.25,4.2) 48(-2.75,4.2)
  silkscreen extent -4.33,-3.1 3.1,3.57, body extent -4.5,-4.5 4.5,4.5, height 1.6
LQFP-64 [mm] "TSQFP, 64-Leads, Body 10.00x10.00mm, Pitch 0.50mm, IPC Medium Density"
  oval 1.45x0.3 smd: 1(-5.725,3.75) 2(-5.725,3.25) 3(-5.725,2.75) 4(-5.725,2.25) 5(-5.725,1.75) 6(-5.725,1.25) 7(-5.725,0.75) 8(-5.725,0.25) 9(-5.725,-0.25) 10(-5.725,-0.75) 11(-5.725,-1.25) 12(-5.725,-1.75) 13(-5.725,-2.25) 14(-5.725,-2.75) 15(-5.725,-3.25) 16(-5.725,-3.75) 33(5.725,-3.75) 34(5.725,-3.25) 35(5.725,-2.75) 36(5.725,-2.25) 37(5.725,-1.75) 38(5.725,-1.25) 39(5.725,-0.75) 40(5.725,-0.25) 41(5.725,0.25) 42(5.725,0.75) 43(5.725,1.25) 44(5.725,1.75) 45(5.725,2.25) 46(5.725,2.75) 47(5.725,3.25) 48(5.725,3.75)
  oval 0.3x1.45 smd: 17(-3.75,-5.725) 18(-3.25,-5.725) 19(-2.75,-5.725) 20(-2.25,-5.725) 21(-1.75,-5.725) 22(-1.25,-5.725) 23(-0.75,-5.725) 24(-0.25,-5.725) 25(0.25,-5.725) 26(0.75,-5.725) 27(1.25,-5.725) 28(1.75,-5.725) 29(2.25,-5.725) 30(2.75,-5.725) 31(3.25,-5.725) 32(3.75,-5.725) 49(3.75,5.725) 50(3.25,5.725) 51(2.75,5.725) 52(2.25,5.725) 53(1.75,5.725) 54(1.25,5.725) 55(0.75,5.725) 56(0.25,5.725) 57(-0.25,5.725) 58(-0.75,5.725) 59(-1.25,5.725) 60(-1.75,5.725) 61(-2.25,5.725) 62(-2.75,5.725) 63(-3.25,5.725) 64(-3.75,5.725)
  silkscreen extent -5.85,-4.6 4.6,4.6, body extent -6,-6 6,6, height 1.45
MSOP8 [mm] "TSOP, 8-Leads, Body 3.00x3.00mm, Pitch 0.65mm, IPC Medium Density"
  oval 1.35x0.5 smd: 1(-2.275,0.975) 2(-2.275,0.325) 3(-2.275,-0.325) 4(-2.275,-0.975) 5(2.275,-0.975) 6(2.275,-0.325) 7(2.275,0.325) 8(2.275,0.975)
  silkscreen extent -1.2,-1.6 1.2,1.6, body extent -2.45,-1.6 2.45,1.6, height 1.1
RGB1.6*1.6 [mm]
  rect 0.55x0.7 smd: 1(-0.4,0.75) 2(0.4,0.75) 3(0.4,-0.75) 4(-0.4,-0.75)
  silkscreen extent -0.08,-0.2 0.08,-0.05
SC70 [mm]
  rect 0.85x0.4 smd: 1(-1.1,0.65) 2(-1.1,0) 3(-1.1,-0.65) 4(1.1,-0.65) 5(1.1,0) 6(1.1,0.65)
  silkscreen extent -1.22,-1.1 0.3,1.42, body extent -1.2,-1.07 1.2,1.07, height 1.1
"SMB (DO-214AA)" [mm] "Molded Diode, 2-Leads, Body 4.38x3.62mm, IPC Medium Density"
  rect 2.2x2.1 smd: 1(-1.9,0) 2(1.9,0)
  silkscreen extent -2.35,-2 3.12,2, body extent -2.35,-1.97 2.35,1.97, height 2.4
SOD-123 [mm]
  rect 0.9x0.7 smd: 1(1.7,0) 2(-1.7,0)
  silkscreen extent -2.1,-0.85 1.4,0.85, body extent -1.4,-0.85 1.4,0.85, height 1.25
SON-10-DQA [mm] "SON, 10-Leads, Body 2.50x1.00mm, Pitch 0.50mm, IPC Medium Density"
  rect 0.58x0.2 smd: 1(-0.435,1) 2(-0.435,0.5) 4(-0.435,-0.5) 5(-0.435,-1) 6(0.435,-1) 7(0.435,-0.5) 9(0.435,0.5) 10(0.435,1)
  rect 0.58x0.4 smd: 3(-0.435,0) 8(0.435,0)
  silkscreen extent -0.8,-1.45 0.55,1.5, body extent -0.55,-1.3 0.55,1.3, height 0.55
SON-14-RVZ [mm] "SON, 14-Leads, Body 3.50x1.35mm, Pitch 0.50mm, IPC Medium Density"
  rect 0.75x0.2 smd: 1(-0.645,1.5) 2(-0.645,1) 3(-0.645,0.5) 4(-0.645,0) 5(-0.645,-0.5) 6(-0.645,-1) 7(-0.645,-1.5) 8(0.645,-1.5) 9(0.645,-1) 10(0.645,-0.5) 11(0.645,0) 12(0.645,0.5) 13(0.645,1) 14(0.645,1.5)
  silkscreen extent -1.07,-1.95 0.72,2, body extent -0.73,-1.8 0.73,1.8, height 0.55
SOT23 [mm]
  rect 0.95x0.6 smd: 1(-1.175,0.95) 2(-1.175,-0.95) 3(1.175,0)
  silkscreen extent -0.37,-1.5 0.7,1.5, body extent -1.28,-1.5 1.28,1.5, height 1.15
SOT23-5 [mm]
  rect 1x0.6 smd: 1(-1.35,0.95) 2(-1.35,0) 3(-1.35,-0.95) 4(1.35,-0.95) 5(1.35,0.95)
  silkscreen extent -0.45,-1.5 0.45,1.5, body extent -1.5,-1.5 1.5,1.5, height 1.5
SOT23-8 [mm] "TSOP, 8-Leads, Body 2.90x1.63mm, Pitch 0.65mm, IPC Medium Density"
  rect 0.95x0.5 smd: 1(-1.375,0.975) 2(-1.375,0.325) 3(-1.375,-0.325) 4(-1.375,-0.975) 5(1.375,-0.975) 6(1.375,-0.325) 7(1.375,0.325) 8(1.375,0.975)
  silkscreen extent -0.5,-1.5 0.5,1.5, body extent -1.39,-1.5 1.39,1.5, height 1.45
SOT236 [mm] "SOT23, 6-Leads, Body 2.90x2.80mm, Pitch 0.95mm, IPC Medium Density"
  rect 1x0.6 smd: 1(-1.375,0.95) 2(-1.375,0) 3(-1.375,-0.95) 4(1.375,-0.95) 5(1.375,0) 6(1.375,0.95)
  silkscreen extent -0.5,-1.55 0.5,1.55, body extent -1.53,-1.53 1.53,1.53, height 1.1
SW-SS-3456S-02-L1 [mm]
  rect 1.1x2 smd: 1(-5,2.8) 2(-3,2.8) 3(1,2.8) 4(3,2.8) 5(5,2.8) 6(-5,-2.8) 7(-3,-2.8) 8(1,-2.8) 9(3,-2.8) 10(5,-2.8)
  silkscreen extent -7.7,-1.9 7.7,1.9
TSSOP-24 [mm] "TSOP, 24-Leads, Body 7.80x4.40mm, Pitch 0.65mm, IPC Medium Density"
  rect 1.45x0.45 smd: 1(-2.975,3.575) 2(-2.975,2.925) 3(-2.975,2.275) 4(-2.975,1.625) 5(-2.975,0.975) 6(-2.975,0.325) 7(-2.975,-0.325) 8(-2.975,-0.975) 9(-2.975,-1.625) 10(-2.975,-2.275) 11(-2.975,-2.925) 12(-2.975,-3.575) 13(2.975,-3.575) 14(2.975,-2.925) 15(2.975,-2.275) 16(2.975,-1.625) 17(2.975,-0.975) 18(2.975,-0.325) 19(2.975,0.325) 20(2.975,0.975) 21(2.975,1.625) 22(2.975,2.275) 23(2.975,2.925) 24(2.975,3.575)
  silkscreen extent -3.1,-3.95 1.85,4.47, body extent -3.25,-3.95 3.25,3.95, height 1.2
USB-C-16P#1 [mm]
  rrect50% 1x2.1 hole 0.6 slot 1.7 at 90 deg: 0(-4.32,4.18) 0(4.32,4.18)
  rrect50% 1x1.8 hole 0.6 slot 1.4 at 90 deg: 0(-4.32,0) 0(4.32,0)
  rect 0.3x1.14 smd: A1(-3.35,4.75) A4(-2.55,4.75) A5(-1.25,4.75) A6(-0.25,4.75) A7(0.25,4.75) A8(1.25,4.75) A9(2.55,4.75) A12(3.35,4.75) B5(1.75,4.75) B6(0.75,4.75) B7(-0.75,4.75) B8(-1.75,4.75)
  rect 0.4x1.14 smd: B1(3.1,4.75) B4(2.3,4.75) B9(-2.3,4.75) B12(-3.1,4.75)
  round 0 hole 0.65: ""(-2.89,3.68) ""(2.89,3.68)
  silkscreen extent -4.5,-2.7 4.5,2.7, body extent -4.47,-2.61 4.47,4.97, height 3.28
USB-C-16P#2 [mm]
  rrect50% 1x2.1 hole 0.6 slot 1.7 at 90 deg: 0(-4.32,-4.18) 0(4.32,-4.18)
  rrect50% 1x1.8 hole 0.6 slot 1.4 at 90 deg: 0(-4.32,0) 0(4.32,0)
  rect 0.3x1.14 smd: A1(-3.35,-4.75) A4(-2.55,-4.75) A5(-1.25,-4.75) A6(-0.25,-4.75) A7(0.25,-4.75) A8(1.25,-4.75) A9(2.55,-4.75) A12(3.35,-4.75) B5(1.75,-4.75) B6(0.75,-4.75) B7(-0.75,-4.75) B8(-1.75,-4.75)
  rect 0.4x1.14 smd: B1(3.1,-4.75) B4(2.3,-4.75) B9(-2.3,-4.75) B12(-3.1,-4.75)
  round 0 hole 0.65: ""(-2.89,-3.68) ""(2.89,-3.68)
  body extent -4.47,-4.97 4.47,2.61, height 3.28
XT30PW-F30 [mm]
  round 3 hole 1.9: 1(2.5,0) 2(-2.5,0)
  round 1.8 hole 1.2: 3(-5.5,5) 4(5.5,5)
  silkscreen extent -6.8,0 6.8,14.2
XT30PW-M30 [mm]
  round 3 hole 1.9: 1(-2.5,0) 2(2.5,0)
  round 1.8 hole 1.2: 3(-5.5,10) 4(5.5,10)
  silkscreen extent -6.8,0 6.8,14.2
XTAL-3225-4P [mm] "DFN, 4-Leads, Body 2.50x3.20mm, Pitch 2.20mm, IPC Medium Density"
  rect 1.4x1.2 smd: 1(-1.1,-0.85) 2(1.1,-0.85) 3(1.1,0.85) 4(-1.1,0.85)
  body extent -1.8,-1.3 1.78,1.3, height 0.8

## Part data
C1 C2 C3 C4 C7 C8 C9 C12 C13 C14 C15 C16 C17 C18 C19 C20 C21 C22 C23 C24 C27 C28 C29 C30 C31 C32 C33 C34 C37 C38 C39 C40 C41 C42 C43 C44 C45 C46 C47 C48 C49 C50 C51 C52 C53 C54 C55 C56 C57 C58 C59 C60: library part Cap
C5 C6 C10 C11 C25 C26 C35 C36: library part Cap, "CL10A475KA8NQNC"
D1 D3 D4 D5: library part TVS
LED1: library part RGB_CA, "C427425"
P1 P9 P12: "TYPE-C 16PIN 2MD(073)"
P2: "Header, 8-Pin", LatestRevisionDate=17-Jul-2002, LatestRevisionNote="Re-released for DXP Platform.", Publisher="Altium Limited"
P3 P4: "Header, 5-Pin", LatestRevisionDate=17-Jul-2002, LatestRevisionNote="Re-released for DXP Platform.", Publisher="Altium Limited"
P5: "Header, 3-Pin", LatestRevisionDate=17-Jul-2002, LatestRevisionNote="Re-released for DXP Platform.", Publisher="Altium Limited"
P6: "Header, 6-Pin", LatestRevisionDate=17-Jul-2002, LatestRevisionNote="Re-released for DXP Platform.", Publisher="Altium Limited"
Q1 Q2: library part NMOS-D
Q3 Q4 Q5 Q6: library part NMOS-D, "C467174"
R1 R2 R3 R4 R5 R6 R7 R8 R9 R10 R11 R12 R13 R14 R15 R16 R17 R18 R19 R20 R21 R22 R23 R24 R25 R26 R27 R28 R29 R30 R31 R32 R33 R34 R35 R36 R37 R38 R39 R40 R41 R42 R43 R44 R45 R46 R47 R48 R49 R50 R51 R52 R53 R54 R55 R56 R57 R58 R59 R60 R61 R62 R63 R64 R65 R67 R68 R69 R70 R71 R72 R73 R74 R75 R77 R78 R79 R80 R81 R82 R83 R84 R85 R86 R87 R88 R89 R90 R91: library part Res
R66 R76: library part RES-4W
SW1 SW3: library part Btn, "C561512"
U2: library part TPD6E
U3 U4 U13 U15: library part ME6211
U9 U10 U11 U12 U25 U26: library part TPD4E
U14: library part AT32F435CxT
U20 U23: library part INA241
U21 U24: library part ADA4077-2
X1 X2: library part XTAL-4LEAD

## Free pads (board coordinates)
  round 177.17 hole 86.61: ""(157.48,2500) ""(551.18,157.48) ""(2244.09,1574.8) ""(2559.06,2500)

## Via types
v1: diameter 23.62, hole 11.81, Top Layer to Bottom Layer, tented both sides, 232 vias
v2: diameter 19.68, hole 11.81, Top Layer to Bottom Layer, tented both sides, 1 vias

## Nets (pads, with @x,y where several pads share a name; then routed paths per layer and width w, separated by ;. In a path a pad name is that pad's centre, name@x,y a point inside that pad or via, vN(x,y) a via of type N, cw(c..) or ccw(c..) an arc to the next point about the centre after c; other vN are vias at no path point)
+1.8V: C36.2 C37.1 SW2.2 U15.5 U16.1 | length 832.6
  Top Layer w20: U15.5@1383.15,1052.4 C36.2@1444.92,1052.4 ; C36.2@1445,1052.48 C36.2@1444.92,1052.4 ; SW2.2@1883.11,1099.76 1884.31,1100.96 1884.31,1154.31 v1(1885,1155) 1822.52,1217.48 1527.48,1217.48 1444.92,1134.92 C36.2@1444.92,1052.4
  Bottom Layer w20: C37.1@1850,1272.52 1852.6,1269.92 U16.1@1852.6,1214.13 1854.41,1212.32 1854.41,1185.59 v1(1885,1155)
ADC_IN0: C59.1 R49.1 R50.2 U14.10 | length 1478.7
  Top Layer w10: U14.10@1120.35,1328.9 1121.26,1327.99 1149.18,1327.99 1162.39,1314.78 1162.39,1297.61 v1(1165,1295) ; R49.1@1987.48,970 R50.2@1987.48,1030 v1(2025,1030)
  PWR w10: v1(1165,1295) 1250,1295 1370,1415 1960,1415 2035,1340 2035,1042.67 2025,1032.67 v1(2025,1030)
  Bottom Layer w10: v1(1165,1295) C59.1@1212.52,1295
ADC_IN1: C40.1 R54.1 R57.2 U14.11 | length 2166.1
  Top Layer w10: U14.11@1120.35,1348.58 1120.9,1349.12 1164.12,1349.12 v1(1165,1350)
  PWR w10: v1(1165,1350) 1265,1350 1355,1440 1970,1440 2205,1205 2205,580 2315,470 v1(2330,470)
  Bottom Layer w10: v1(1165,1350) 1207.52,1350 C40.1@1212.52,1355 ; v1(2330,470) 2367.48,470 R57.2@2370,467.48 R54.1@2430,467.48
ADC_IN2: C41.1 R55.1 R58.2 U14.12 | length 1688.7
  Top Layer w10: U14.12@1120.35,1368.27 1121.26,1369.17 1152.33,1369.17 1165,1381.84 v1(1165,1385)
  PWR w10: v1(1165,1385) 1260,1385 1340,1465 1985,1465 2230,1220 2230,957.67 2232.39,955.28 2232.39,947.61 v1(2235,945)
  Bottom Layer w10: v1(1165,1385) 1180.31,1400.31 1199.8,1400.31 1212.52,1413.03 C41.1@1212.52,1415 ; v1(2235,945) R55.1@2235,907.48 R58.2@2295,907.48
ADC_IN3: C42.1 R86.1 U14.13 | length 1716.5
  Top Layer w10: U14.13@1063.27,1425.35 1145.35,1425.35 v1(1165,1445)
  PWR w10: v1(1165,1445) 1280,1445 1325,1490 1995,1490 2250,1235 2250,1025 v1(2305,970)
  Bottom Layer w10: v1(1165,1445) 1185.66,1465.66 1203.18,1465.66 C42.1@1212.52,1475 ; v1(2305,970) 2347.52,970 R86.1@2352.52,965
ADC_IN4: C48.2 R67.1 U14.14 | length 931.5
  Top Layer w10: U14.14@1043.58,1425.35 1044.31,1426.08 1044.31,1459.31 1110,1525 1640,1525 v1(1765,1650)
  Bottom Layer w10: v1(1765,1650) C48.2@1765,1687.52 R67.1@1825,1687.52
ADC_IN5: R69.1 U14.15 | length 760.6
  Top Layer w10: U14.15@1023.9,1425.35 1023.9,1473.9 1105,1555 1545,1555 1600,1610 v1(1600,1656.81)
  Bottom Layer w10: v1(1600,1656.81) 1600,1682.52 R69.1@1605,1687.52
ADC_IN6: R68.1 U14.16 | length 442.6
  Top Layer w10: U14.16@1004.21,1425.35 1004.21,1499.21 1190,1685 v1(1255,1685)
  Bottom Layer w10: v1(1255,1685) 1256.54,1686.54 1294.02,1686.54 R68.1@1295,1687.52
ADC_IN7: C54.2 R77.1 U14.17 | length 1782.3
  Top Layer w10: U14.17@984.53,1425.35 984.53,1514.53 1035,1565 v1(1035,1780)
  Bottom Layer w10: v1(1035,1780) 1035,2255 1155,2375 1730,2375 1765,2410 C54.2@1765,2487.52 R77.1@1825,2487.52
ADC_IN8: R79.1 U14.18 | length 1564.6
  Top Layer w10: U14.18@964.84,1425.35 964.84,1534.84 1000,1570 v1(1000,1780)
  Bottom Layer w10: v1(1000,1780) 1000,2255 1140,2395 1545,2395 1605,2455 R79.1@1605,2487.52
ADC_IN9: R78.1 U14.19 | length 1265.4
  Top Layer w10: U14.19@945.16,1425.35 945.16,1550.16 965,1570 965,1775 v1(960,1780)
  Bottom Layer w10: v1(960,1780) 960,2245 1202.52,2487.52 R78.1@1295,2487.52
ARM_NTRST: R13.1 U1.22 | length 1016.1
  Top Layer w10: U1.22@855.79,324.61 855.79,270.06 875,250.85 v1(875,250)
  Bottom Layer w10: v1(875,250) 905,220 1315,220 1607.48,512.48 R13.1@1675,512.48
ARM_NTRST_OUT: P2.7 Q2.3 R11.1 U12.2 U12.9 | length 1139
  Bottom Layer w10: R11.1@1812.48,580 1825.2,567.28 1825.2,560.52 1826.26,559.46 Q2.3@1826.26,480 1832.75,486.49 1851.49,486.49 1865,500 1865,550 1960,645 2365,645 2468.19,748.19 2504.03,748.19 2506.16,750.31 2562.48,750.31 2564.61,748.19 2606.81,748.19 P2.7@2685,670
AVCC_FT: C7.2 C8.2 C9.2 C11.2 U1.4 U1.9 U4.5 | length 803
  Top Layer w10: U1.9@679.61,540.16 679.95,539.81 711.5,539.81 716.31,535 v1(720,535) ; U1.4@679.61,638.58 679.95,638.93 718.93,638.93 v1(720,640)
  Top Layer w15: U4.5@358.15,262.4 409.92,262.4 427.52,280 565,280 v1(640,355)
  Bottom Layer w10: C7.2@687.48,540 692.48,535 v1(720,535) ; C8.2@687.48,660 687.48,658.03 700.2,645.31 702.17,645.31 704.87,642.61 717.39,642.61 v1(720,640)
  Bottom Layer w15: v1(640,355) 687.48,402.48 C9.2@687.48,480 C7.2@687.48,540 C8.2@687.48,658.03
DEBUG_RX: P6.4 U14.31 | length 779.3
  Top Layer w10: v1(740,1260) 742.31,1260 752.15,1250.16 U14.31@789.65,1250.16
  Bottom Layer w10: P6.4@60,1370 170,1260 v1(740,1260)
DEBUG_TX: P6.5 U14.30 | length 923.3
  Top Layer w10: U14.30@789.65,1269.84 844.84,1269.84 v1(845,1270)
  Bottom Layer w10: P6.5@60,1470 245,1285 830,1285 v1(845,1270)
EECLK: R5.2 U1.62 U5.4 | length 369.5
  Top Layer w10: R5.2@710,1072.52 708.03,1072.52 695.31,1059.8 695.31,1057.83 680.44,1042.96 680.44,1017.17 U5.4@677.4,1014.13 677.4,1013.46 684.21,1006.65 698.35,1006.65 796.73,908.27 U1.62@796.73,775.39
EECS: R6.2 U1.63 U5.5 | length 382.2
  Top Layer w10: R6.2@650,1072.52 640,1062.52 U5.5@640,1014.13 640,990 665,965 706.19,965 777.05,894.14 U1.63@777.05,775.39
EEDATA: R4.2 R9.2 U1.61 U5.3 | length 643.7
  Top Layer w10: R4.2@530,1072.52 530,977.48 R9.2@540,967.48 613.83,967.48 621.31,960 v1(625,960) 640,945 660,945 671.91,933.09 671.91,911.35 U5.3@677.4,905.87 ; U1.61@816.42,775.39 816.42,867.73 825,876.31 v1(825,880)
  Bottom Layer w10: v1(625,960) 775,960 825,910 v1(825,880)
EXT_EN1: R62.1 R87.2 U14.21 | length 1414.2
  Top Layer w10: R87.2@652.48,1555 652.48,1556.97 665.2,1569.69 667.17,1569.69 692.48,1595 v1(830,1595) ; U14.21@905.79,1425.35 905.79,1595 ; v1(930,1595) 905.79,1595 ; v1(1250,1820) 940,1820 905.79,1785.79 905.79,1595
  Bottom Layer w10: v1(830,1595) v1(930,1595) ; v1(1250,1820) 1285,1855 v1(1285,2100) 1285,2102.52 1325.31,2142.83 1325.31,2144.8 1338.03,2157.52 R62.1@1340,2157.52
EXT_EN2: R72.1 R88.2 U14.22 | length 2116.4
  Top Layer w10: R88.2@652.48,1495 656.82,1499.34 679.34,1499.34 745,1565 886.1,1565 ; v1(880,1780) 880,1776.31 886.1,1770.21 886.1,1565 ; U14.22@886.1,1425.35 886.1,1565
  Bottom Layer w10: v1(880,1780) 925.2,1825.2 925.2,2714.26 1200.94,2990 1307.52,2990 1325.31,2972.2 1325.31,2970.24 1338.03,2957.52 R72.1@1340,2957.52
EXT_IN1: C43.2 C45.2 D4.2 P7.1 Q3.3 R60.1 U19.5 | length 420.9
  Bottom Layer w10: v1(1220,2010) R60.1@1220,2037.52 ; v1(1315,2055) 1315,2080.98 1395.84,2161.81 1525.71,2161.81 C45.2@1530,2157.52 1527.52,2155.04 C43.2@1527.52,2100 1516.65,2110.87 U19.5@1473.39,2110.87
EXT_IN2: C49.2 C51.2 D5.2 P8.1 P9.A4 P9.A9 P9.B4 P9.B9 Q5.3 R70.1 U22.5 | length 1025
  Top Layer w15: v1(340,2995) 370,2965 401.38,2965 560,2806.38 P8.1@560,2801.57 350.76,2801.57 347.33,2805 v1(345,2805)
  Bottom Layer w10: v1(1220,2810) R70.1@1220,2837.52 ; v1(1315,2855) 1315,2880.98 1395.84,2961.81 1525.71,2961.81 1530,2957.52 1527.52,2955.04 1527.52,2900 1516.65,2910.87 U22.5@1473.39,2910.87
  Bottom Layer w15: P9.B4@302.01,2809.45 338.22,2809.45 342.67,2805 v1(345,2805) ; P9.B9@302.01,2990.55 335.55,2990.55 v1(340,2995)
EXT_ISENS1: R67.2 U20.5 | length 88.1
  Bottom Layer w10: R67.2@1825,1752.48 1866.73,1752.48 1882.17,1767.91 1882.17,1776.77 1887.01,1781.61 U20.5@1895.87,1781.61
EXT_ISENS2: R77.2 U23.5 | length 88.1
  Bottom Layer w10: R77.2@1825,2552.48 1866.73,2552.48 1882.17,2567.91 1882.17,2576.77 1887.01,2581.61 U23.5@1895.87,2581.61
EXT_OUT1: P10.1 R66.2
EXT_OUT2: P11.1 P12.A4 P12.A9 P12.B4 P12.B9 R76.2 R90.2 R91.1 | length 761.3
  Top Layer w15: v1(2415,2785) 2266.57,2785 P11.1@2250,2801.57 2371.57,2801.57 2421.24,2851.24 v1(2421.24,3006.24)
  Bottom Layer w15: R90.2@2370,2742.52 2380.22,2752.74 2382.74,2752.74 v1(2415,2785) 2439.07,2809.07 2462.62,2809.07 P12.B9@2462.99,2809.45 ; R91.1@2370,3057.48 2371.97,3057.48 2382.19,3047.26 2382.19,3045.3 v1(2421.24,3006.24) 2436.56,2990.93 2462.62,2990.93 P12.B4@2462.99,2990.55
EXT_VINSENS1: C44.2 R60.2 R61.1 U21.3 | length 610.6
  Bottom Layer w10: C44.2@1280,2157.52 R61.1@1220,2157.52 R60.2@1220,2102.48 1218.03,2102.48 1205.31,2089.76 1205.31,2087.8 1170,2052.48 1170,1845 1232.2,1782.8 U21.3@1360.43,1782.8
EXT_VINSENS2: C50.2 R70.2 R71.1 U24.3 | length 610.6
  Bottom Layer w10: C50.2@1280,2957.52 R71.1@1220,2957.52 R70.2@1220,2902.48 1218.03,2902.48 1205.31,2889.76 1205.31,2887.8 1170,2852.48 1170,2645 1232.2,2582.8 U24.3@1360.43,2582.8
EXT_VOUTSENS1: C46.2 R64.2 R65.1 U21.5 | length 593.4
  Bottom Layer w10: U21.5@1539.57,1808.39 1588.39,1808.39 1735,1955 1735,2085 1717.52,2102.48 R64.2@1650,2102.48 R65.1@1650,2157.52 C46.2@1590,2157.52
EXT_VOUTSENS2: C52.2 R74.2 R75.1 U24.5 | length 593.4
  Bottom Layer w10: U24.5@1539.57,2608.39 1588.39,2608.39 1735,2755 1735,2885 1717.52,2902.48 1650,2902.48 R75.1@1650,2957.52 ; C52.2@1590,2972.52 R75.1@1650,2972.52
GND: C1.1 C2.1 C3.2 C4.2 C5.1 C6.1 C7.1 C8.1 C9.1 C10.1 C11.1 C12.1 C13.1 C14.1 C15.1 C16.1 C17.1 C18.1 C19.1 C20.1 C21.2 C22.1 C23.2 C24.2 C25.1 C26.1 C27.1 C28.1 C29.1 C30.1 C31.1 C32.1 C33.1 C34.1 C35.1 C36.1 C37.2 C38.2 C39.2 C40.2 C41.2 C42.2 C43.1 C44.1 C46.1 C47.1 C48.1 C49.1 C50.1 C52.1 C53.1 C54.1 C55.1 C56.1 C57.2 C58.1 C59.2 C60.1 D1.1 D3.1 D4.1 D5.1 D7.2 D8.2 P1.0 P1.A1 P1.A12 P1.B1 P1.B12 P2.1 P3.5 P4.5 P5.3 P6.6 P7.2 P7.3 P7.4 P8.2 P8.3 P8.4 P9.0 P9.A1 P9.A12 P9.B1 P9.B12 P10.2 P10.3 P10.4 P11.2 P11.3 P11.4 P12.0 P12.A1 P12.A12 P12.B1 P12.B12 Q1.2 Q2.2 R1.2 R3.1 R7.1 R14.1 R15.1 R45.2 R46.2 R50.1 R51.2 R52.2 R53.2 R57.1 R58.1 R59.1 R61.2 R63.2 R65.2 R71.2 R73.2 R75.2 R80.1 R81.1 SW1.2 SW2.8 SW3.2 U1.1 U1.5 U1.10 U1.11 U1.13 U1.15 U1.25 U1.35 U1.47 U1.51 U2.5 U2.10 U3.2 U4.2 U5.2 U6.11 U6.12 U6.13 U7.2 U7.11 U7.12 U7.13 U8.2 U9.3 U9.8 U10.3 U10.8 U11.3 U11.8 U12.3 U12.8 U13.2 U14.8 U14.47 U15.2 U16.2 U17.2 U18.2 U19.2 U19.7 U20.2 U20.3 U20.7 U21.4 U22.2 U22.7 U23.2 U23.3 U23.7 U24.4 U25.3 U25.8 U26.3 U26.8 X1.2 X1.4 X2.2 X2.4 | length 884.6
  Top Layer w10: U2.10@414.61,599.69 U2.5@465.39,599.69 ; C29.1@1037.52,1025 1043.58,1031.06 U14.47@1043.58,1094.65
  Bottom Layer w10: P9.B1@302.01,2777.95 359.57,2777.95 380.31,2757.2 380.31,2755.24 393.03,2742.52 R81.1@395,2742.52 ; P9.B12@302.01,3022.05 314.9,3022.05 317.77,3024.92 317.77,3031.89 364.41,3031.89 R80.1@395,3062.48 ; U25.3@377.87,2900 U25.8@412.13,2900 413.63,2898.5 433.5,2898.5 v1(435,2897) ; C39.2@1560,1337.48 1561.97,1337.48 1574.69,1324.76 1574.69,1322.8 1600,1297.48 U18.2@1600,1214.13 ; C38.2@1705,1337.48 1706.97,1337.48 1719.69,1324.76 1719.69,1322.8 1745,1297.48 U17.2@1745,1214.13 ; C37.2@1850,1337.48 1851.97,1337.48 1864.69,1324.76 1864.69,1322.8 1890,1297.48 U16.2@1890,1214.13 ; v1(2330.8,2902.75) 2332.17,2901.38 2351.5,2901.38 U26.8@2352.87,2900 U26.3@2387.13,2900
  other v1: 1850,120 800,160 1320,160 2055,160 2215,160 190,170 420,170 1570,170 1880,170 1795,190 2055,220 2215,220 1625,255 2055,280 2492.35,308.49 2585,310 2215,315 1655,325 290,330 1325,330 715,335 2055,340 1190,365 915,370 610,385 1705,385 2335,400 2055,405 1260,415 735,440 2135,440 990,460 355,465 2055,465 855,485 1745,490 2220,490 575,495 920,520 2055,530 755,535 1515,570 2255,575 960,590 1855,590 750,615 2450,615 1575,630 1075,680 355,695 1205,720 690,725 1015,725 1330,760 640,770 2490,770 2580,770 355,800 2325,800 1330,820 1725,825 640,865 1140,870 920,880 995,880 1330,880 1210,885 1515,903.39 1230,955 2035,975 1146.41,977.28 1690,1000 1505,1005 1870,1010 2540,1035 1090,1070 2365,1070 1240,1095 355,1100 355,1180 2365.26,1185.86 2000,1195 2110,1230 1080.24,1290.22 1315,1315 895,1320 2355,1320 2450,1320 540,1345 375,1365 1025,1370 1380,1370 1730,1385 2227.2,1391.13 1120,1475 740,1495 395,1555 250,1605 2014.79,1605.03 1265,1610 1400,1610 825,1650 1080,1650 935,1655 530,1665 1420,2140 1280,2260 1420,2940 1280,3060
  other v2: 440,600
ICC1: P9.A5 R80.2 U25.4 U25.7 | length 260.9
  Bottom Layer w10: P9.A5@302.01,2949.21 302.91,2948.31 326.69,2948.31 355.31,2919.69 U25.4@377.87,2919.69 U25.7@412.13,2919.69 429.69,2919.69 445,2935 445,2975 423.83,2996.17 396.35,2996.17 R80.2@395,2997.52
ICC2: P9.B5 R81.2 U25.1 U25.10 | length 241.9
  Bottom Layer w10: P9.B5@302.01,2831.1 336.1,2831.1 365.63,2860.63 U25.1@377.87,2860.63 429.37,2860.63 445,2845 445,2820 433.83,2808.83 396.35,2808.83 R81.2@395,2807.48
IN0: R44.1 U1.43 | length 341.4
  Top Layer w10: U1.43@1130.39,599.21 1254.21,599.21 1295,640 1295,700 1325,730 R44.1@1382.52,730
IN0_IN: R25.1 U7.16 | length 120
  Top Layer w10: U7.16@1807.13,741.02 1911.5,741.02 R25.1@1922.52,730
IN1: R43.1 U1.44 | length 378.6
  Top Layer w10: U1.44@1130.39,618.9 1243.9,618.9 1275,650 1275,745 1320,790 R43.1@1382.52,790
IN1_IN: R26.1 U7.17 | length 125.1
  Top Layer w10: U7.17@1807.13,766.61 1871.61,766.61 1895,790 R26.1@1922.52,790
IN2: R42.1 U1.45 | length 421.7
  Top Layer w10: U1.45@1130.39,638.58 1233.58,638.58 1255,660 1255,800 1305,850 R42.1@1382.52,850
IN2_IN: R27.1 U7.18 | length 140.5
  Top Layer w10: U7.18@1807.13,792.2 1857.2,792.2 1880,815 1900.31,835.31 1909.8,835.31 1922.52,848.03 R27.1@1922.52,850
IN3: R41.1 U1.46 | length 464.8
  Top Layer w10: U1.46@1130.39,658.27 1218.27,658.27 1235,675 1235,860 1285,910 R41.1@1382.52,910
IN3_IN: R28.1 U7.19 | length 185.8
  Top Layer w10: U7.19@1807.13,817.8 1847.8,817.8 1860,830 1860,885 1885,910 R28.1@1922.52,910
ISBU1: P9.A8 U25.2 U25.9 | length 122.3
  Bottom Layer w10: P9.A8@302.01,2850.79 302.4,2851.18 331.18,2851.18 360.31,2880.31 U25.2@377.87,2880.31 U25.9@412.13,2880.31
ISBU2: P9.B8 U25.5 U25.6 | length 122.3
  Bottom Layer w10: P9.B8@302.01,2968.9 302.24,2968.66 331.34,2968.66 360.63,2939.37 U25.6@412.13,2939.37
KEY1: C60.2 R89.2 SW3.1 U14.23 | length 910
  Top Layer w10: C60.2@317.48,1740 320.79,1743.31 SW3.1@460.12,1743.31 SW3.1@599.88,1743.31 603.82,1743.31 614.65,1732.48 R89.2@660,1732.48 662.48,1730 v1(745,1730) ; v1(865,1365) 866.42,1366.42 U14.23@866.42,1425.35
  Bottom Layer w10: v1(745,1730) 745,1630 865,1510 v1(865,1365)
LED: R85.2 U14.25 | length 166
  Top Layer w10: R85.2@652.48,1435 652.48,1433.03 665.2,1420.31 667.17,1420.31 719.21,1368.27 U14.25@789.65,1368.27
LED_B: R84.2 U14.28 | length 159.6
  Top Layer w10: R84.2@652.48,1255 695,1255 749.21,1309.21 U14.28@789.65,1309.21
LED_G: R83.2 U14.27 | length 143.6
  Top Layer w10: R83.2@652.48,1315 652.48,1316.18 665.2,1328.9 U14.27@789.65,1328.9
LED_R: R82.2 U14.26 | length 149.3
  Top Layer w10: R82.2@652.48,1375 652.48,1373.03 665.2,1360.31 667.17,1360.31 678.9,1348.58 U14.26@789.65,1348.58
MCU_RX: U1.48 U14.39 | length 743.5
  Top Layer w10: v1(885,1145) 886.1,1143.9 U14.39@886.1,1094.65 ; U1.48@1130.39,697.64 1162.64,697.64 1175,710 v1(1175,805)
  Bottom Layer w10: v1(885,1145) 885,1025 920,990 1070,990 1175,885 v1(1175,805)
MCU_TX: U1.52 U14.40 | length 355.6
  Top Layer w10: U14.40@905.79,1094.65 905.79,1014.21 970,950 970,835.75 993.58,812.17 993.58,809.85 U1.52@993.58,775.39
NetC3_1: C3.1 U1.2 X1.3 | length 276.6
  Top Layer w6.8: C3.1@537.52,840 531.54,834.02 X1.3@531.54,773.31 531.54,769.37 551.76,749.15 555.69,749.15 574.84,730 625,730 635,720 635,690 647.05,677.95 U1.2@679.61,677.95